# Altium PCB MD041A_ASCII.PcbDoc (part 1 of 6)
Units mil, origin at the board's own origin, x right, y up, seen from the top; angles counter-clockwise.
Board outline 6709.84 x 5059.84 mil, 4 copper layers (Top Layer, Signal Layer 1, Signal Layer 2, Bottom Layer), stack 61.2 mil thick; 351 components, 206 nets, 927 pads, 324 vias.
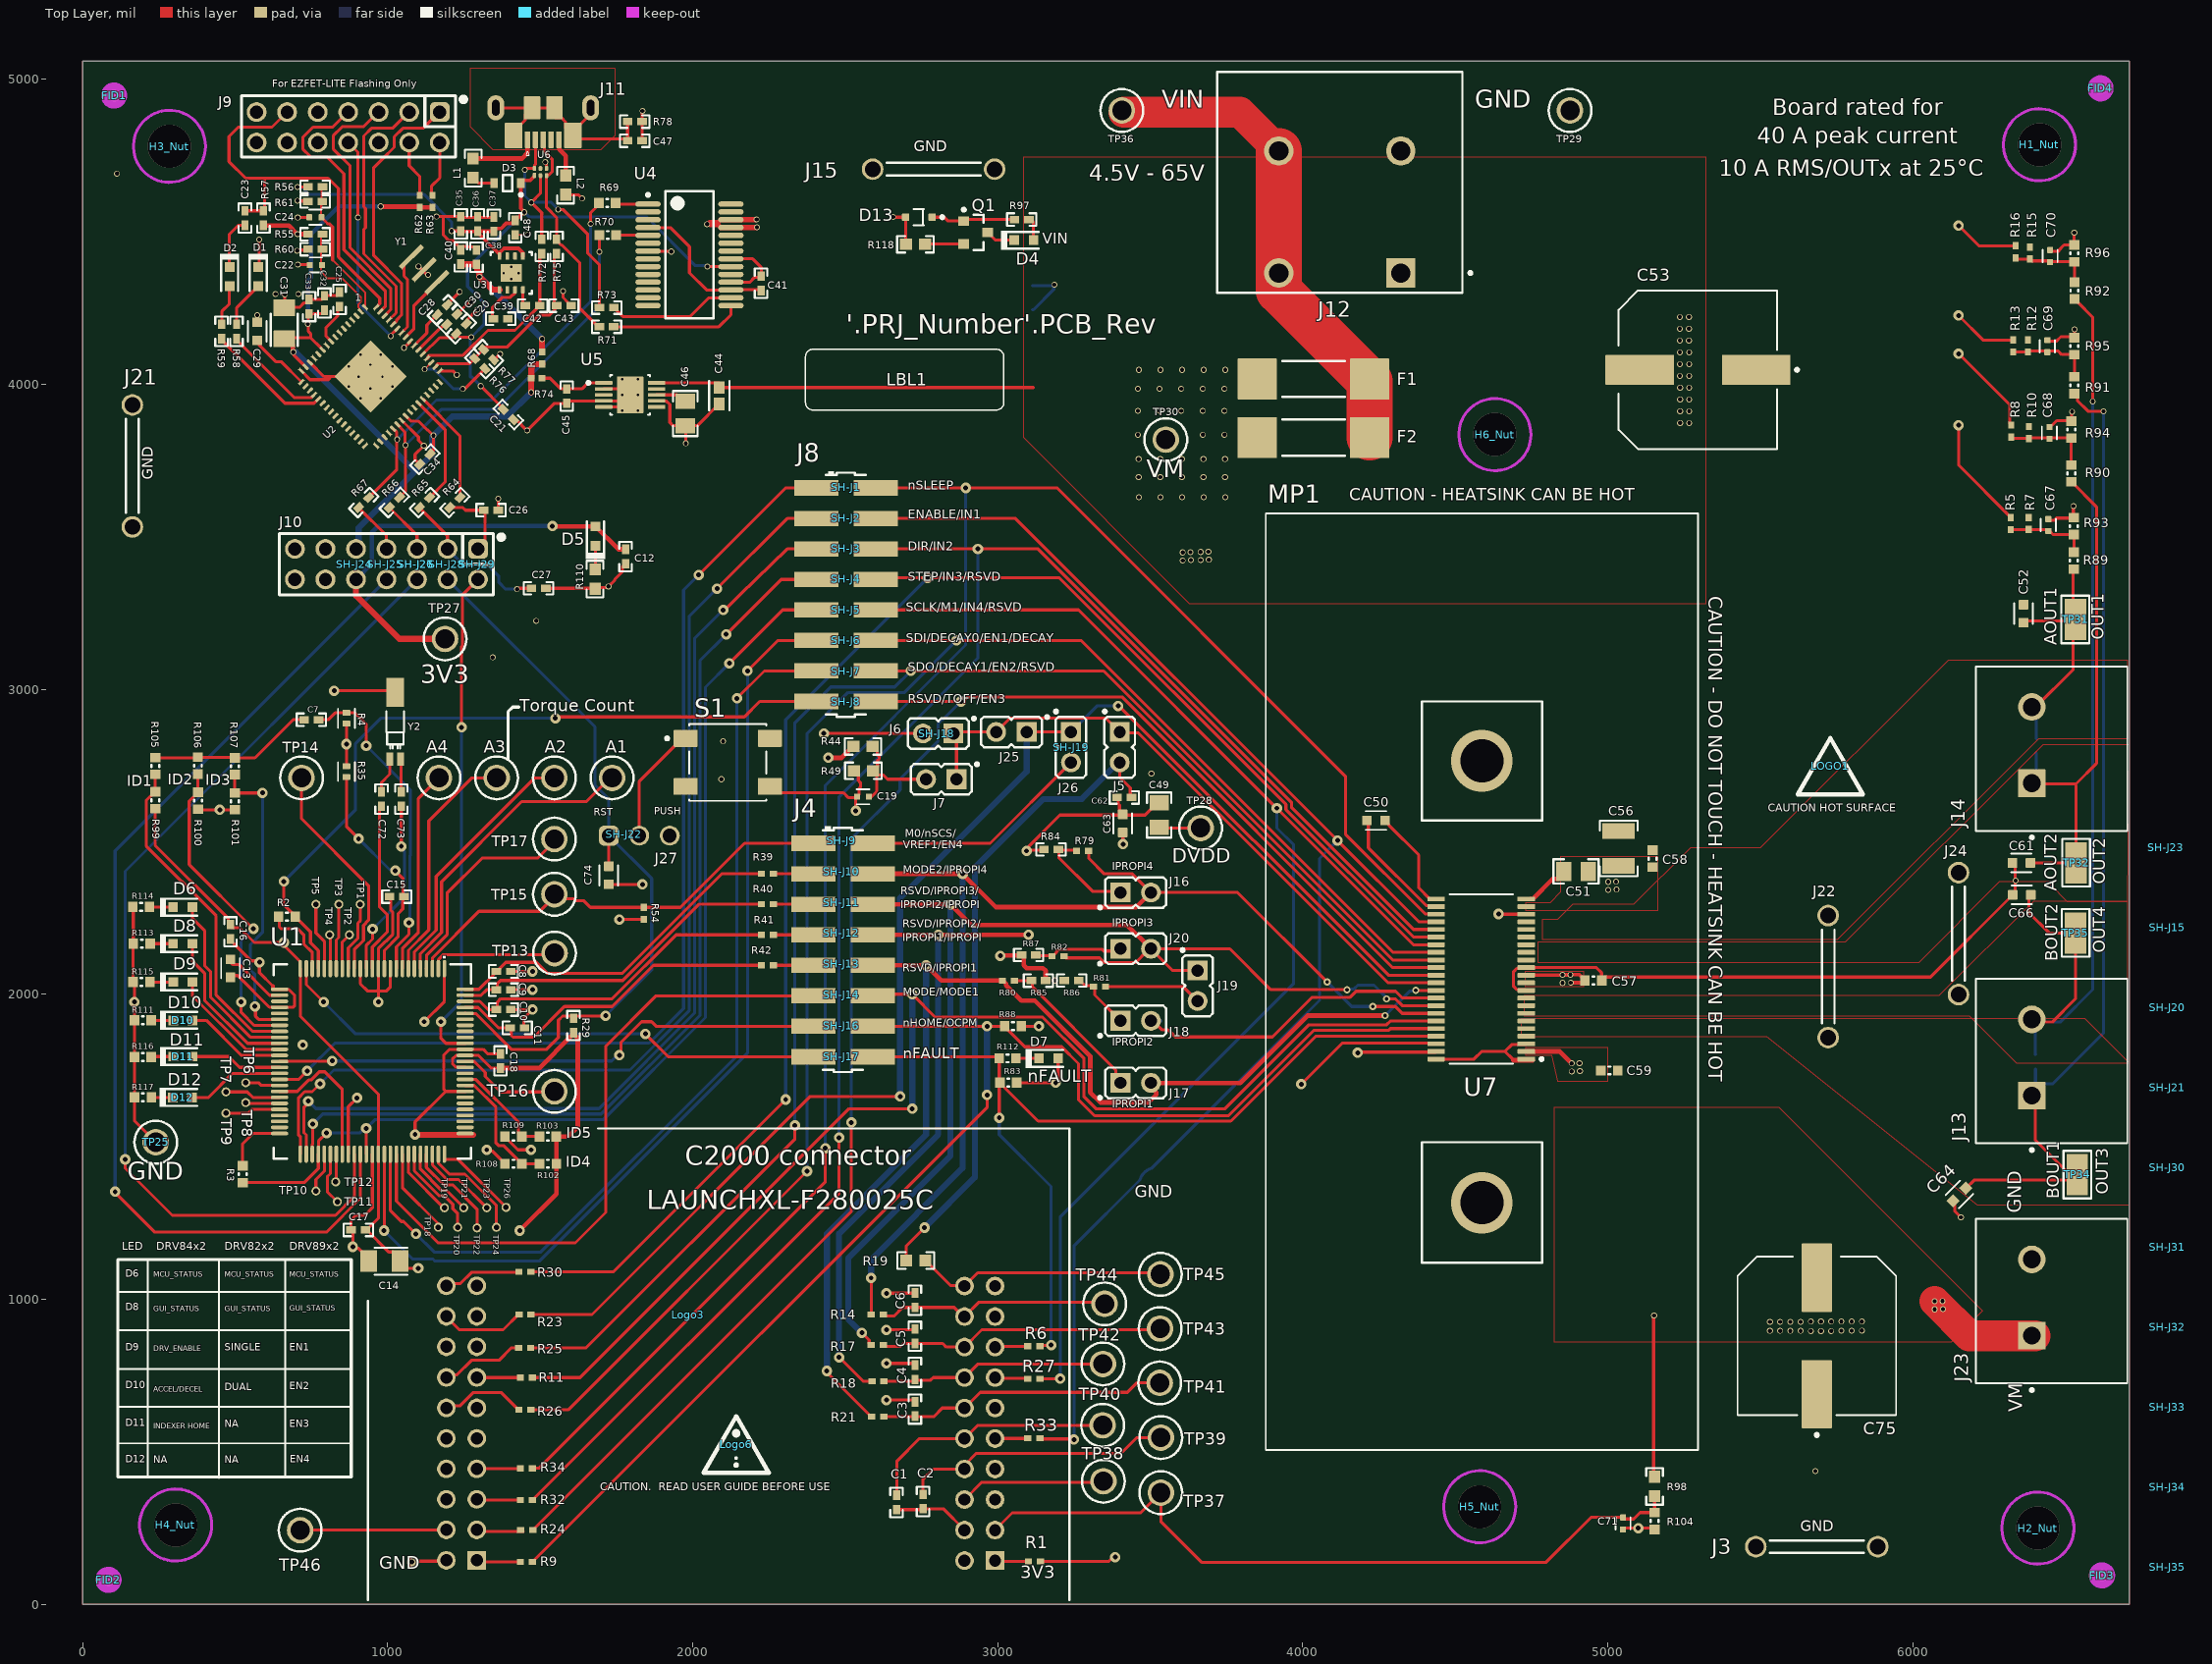
[diagram p0: Top Layer view]
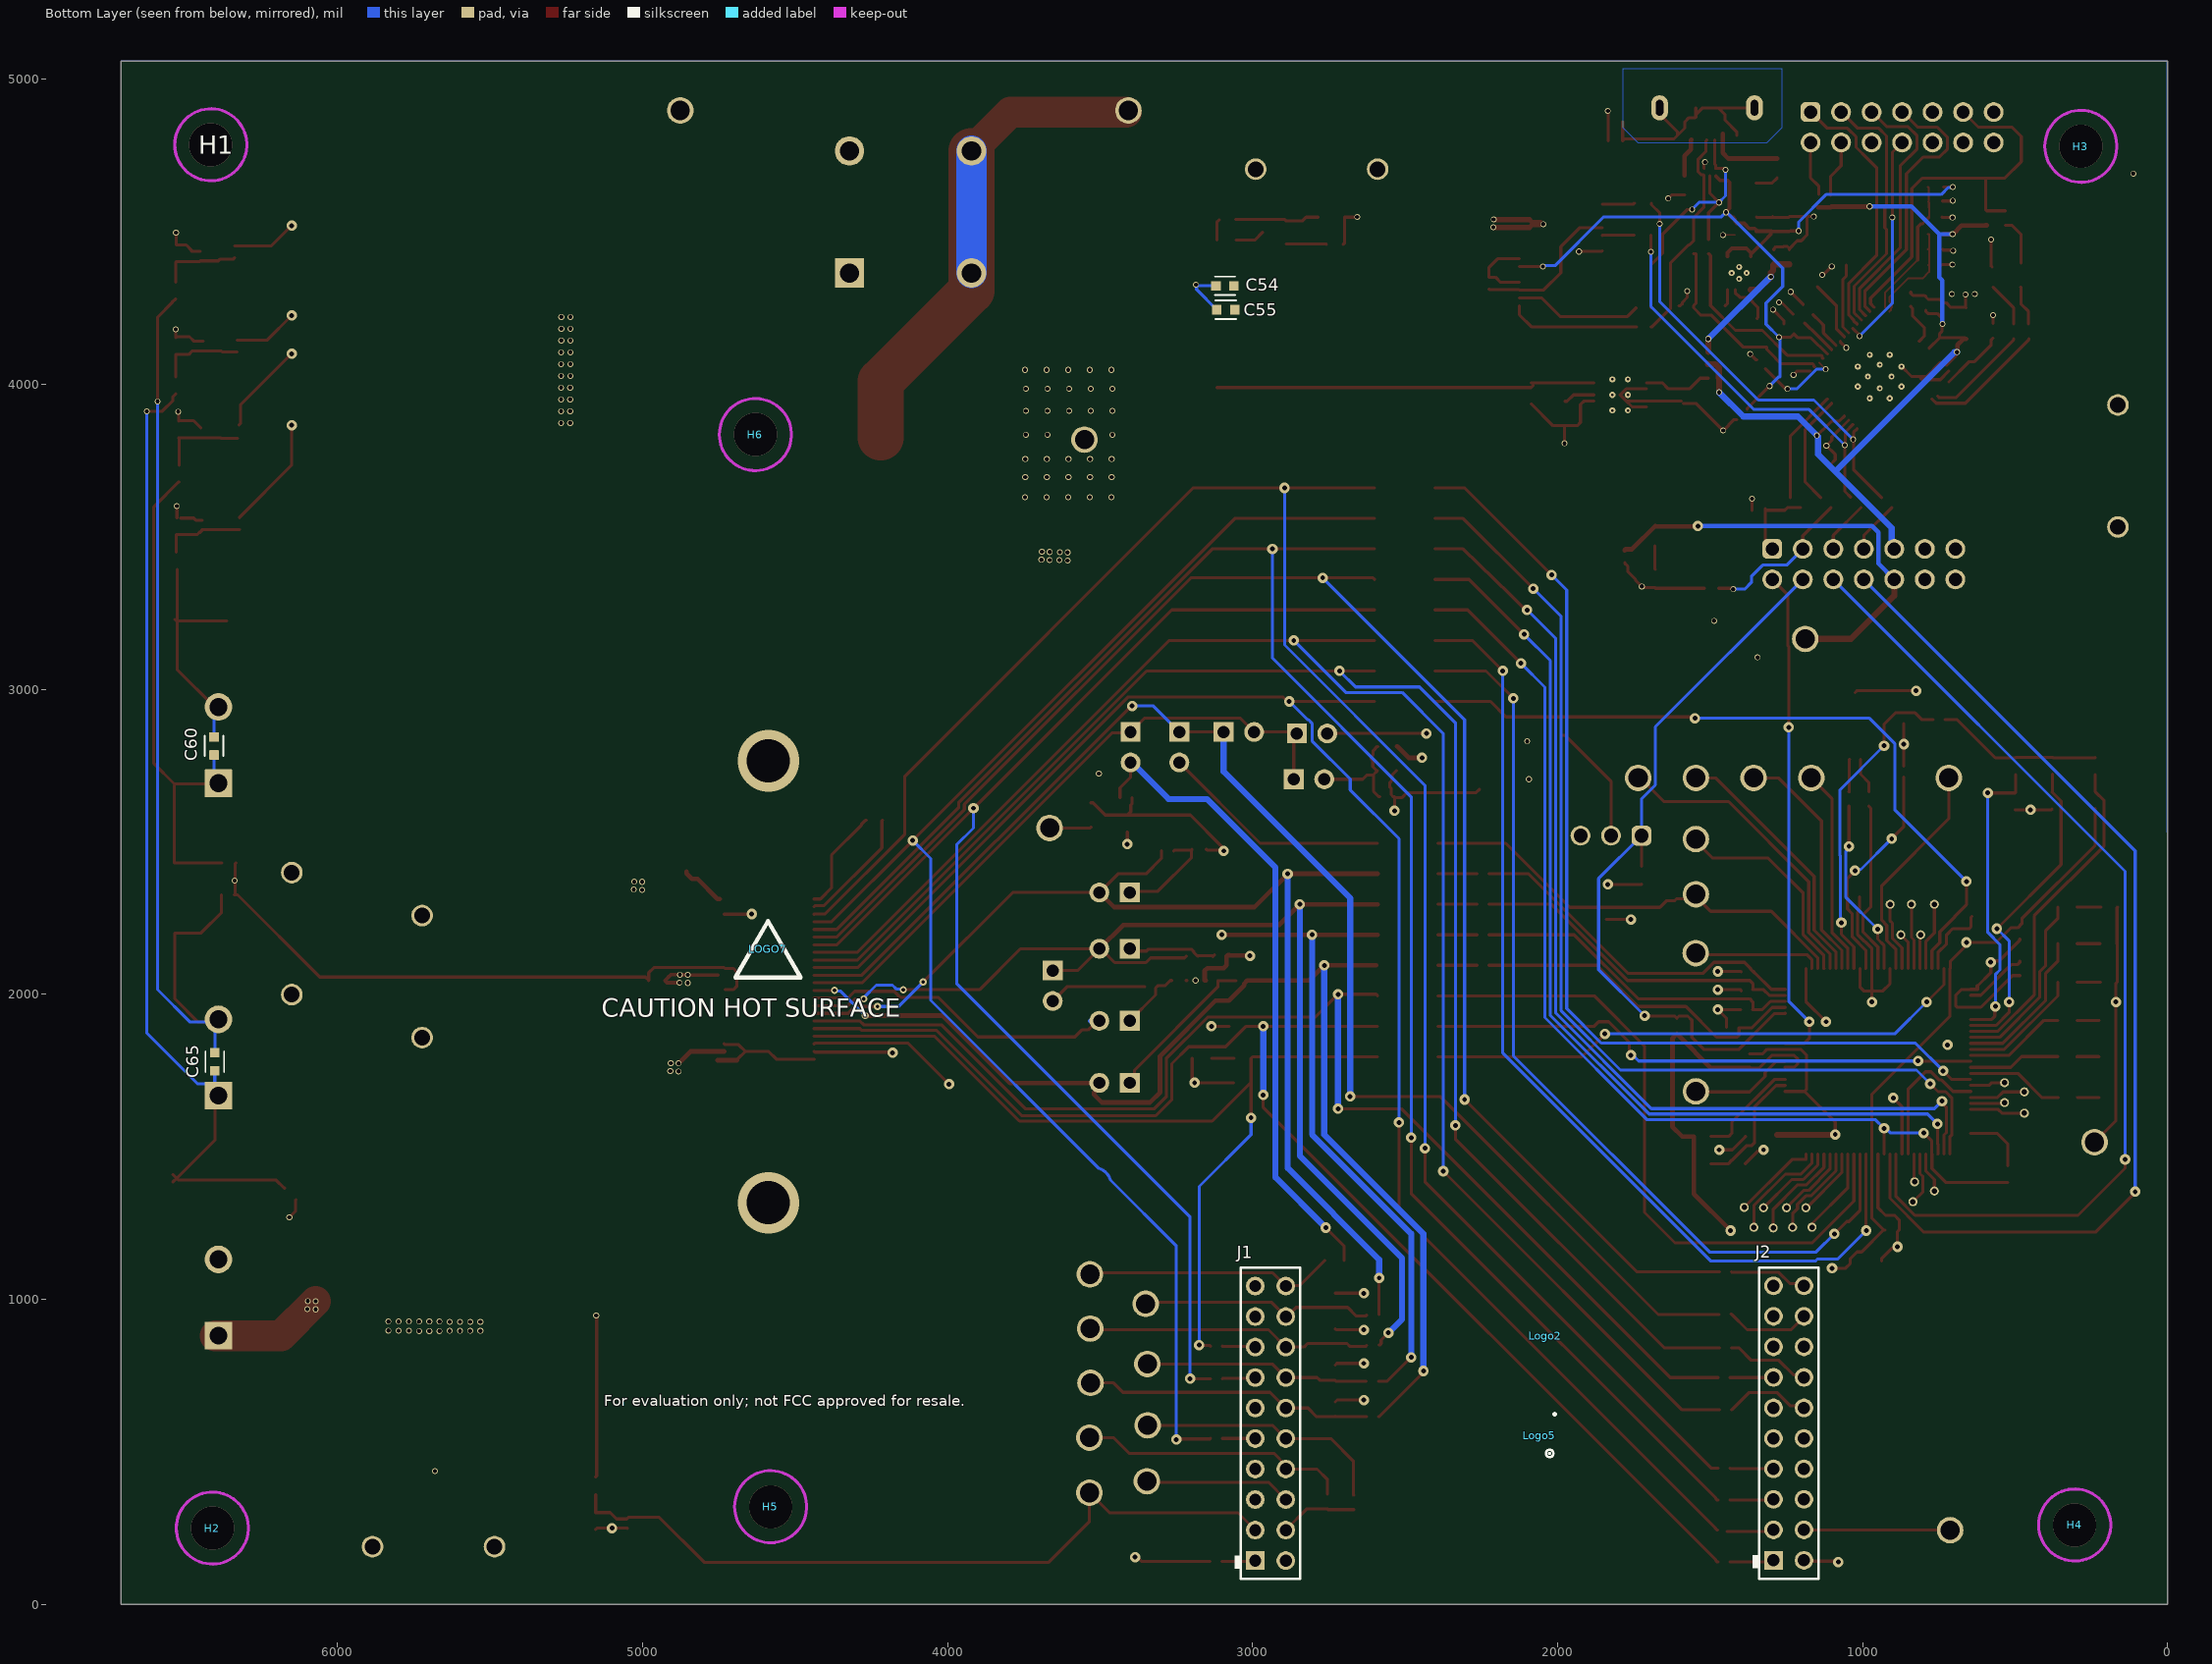
[diagram p1: Bottom Layer view, seen from below]
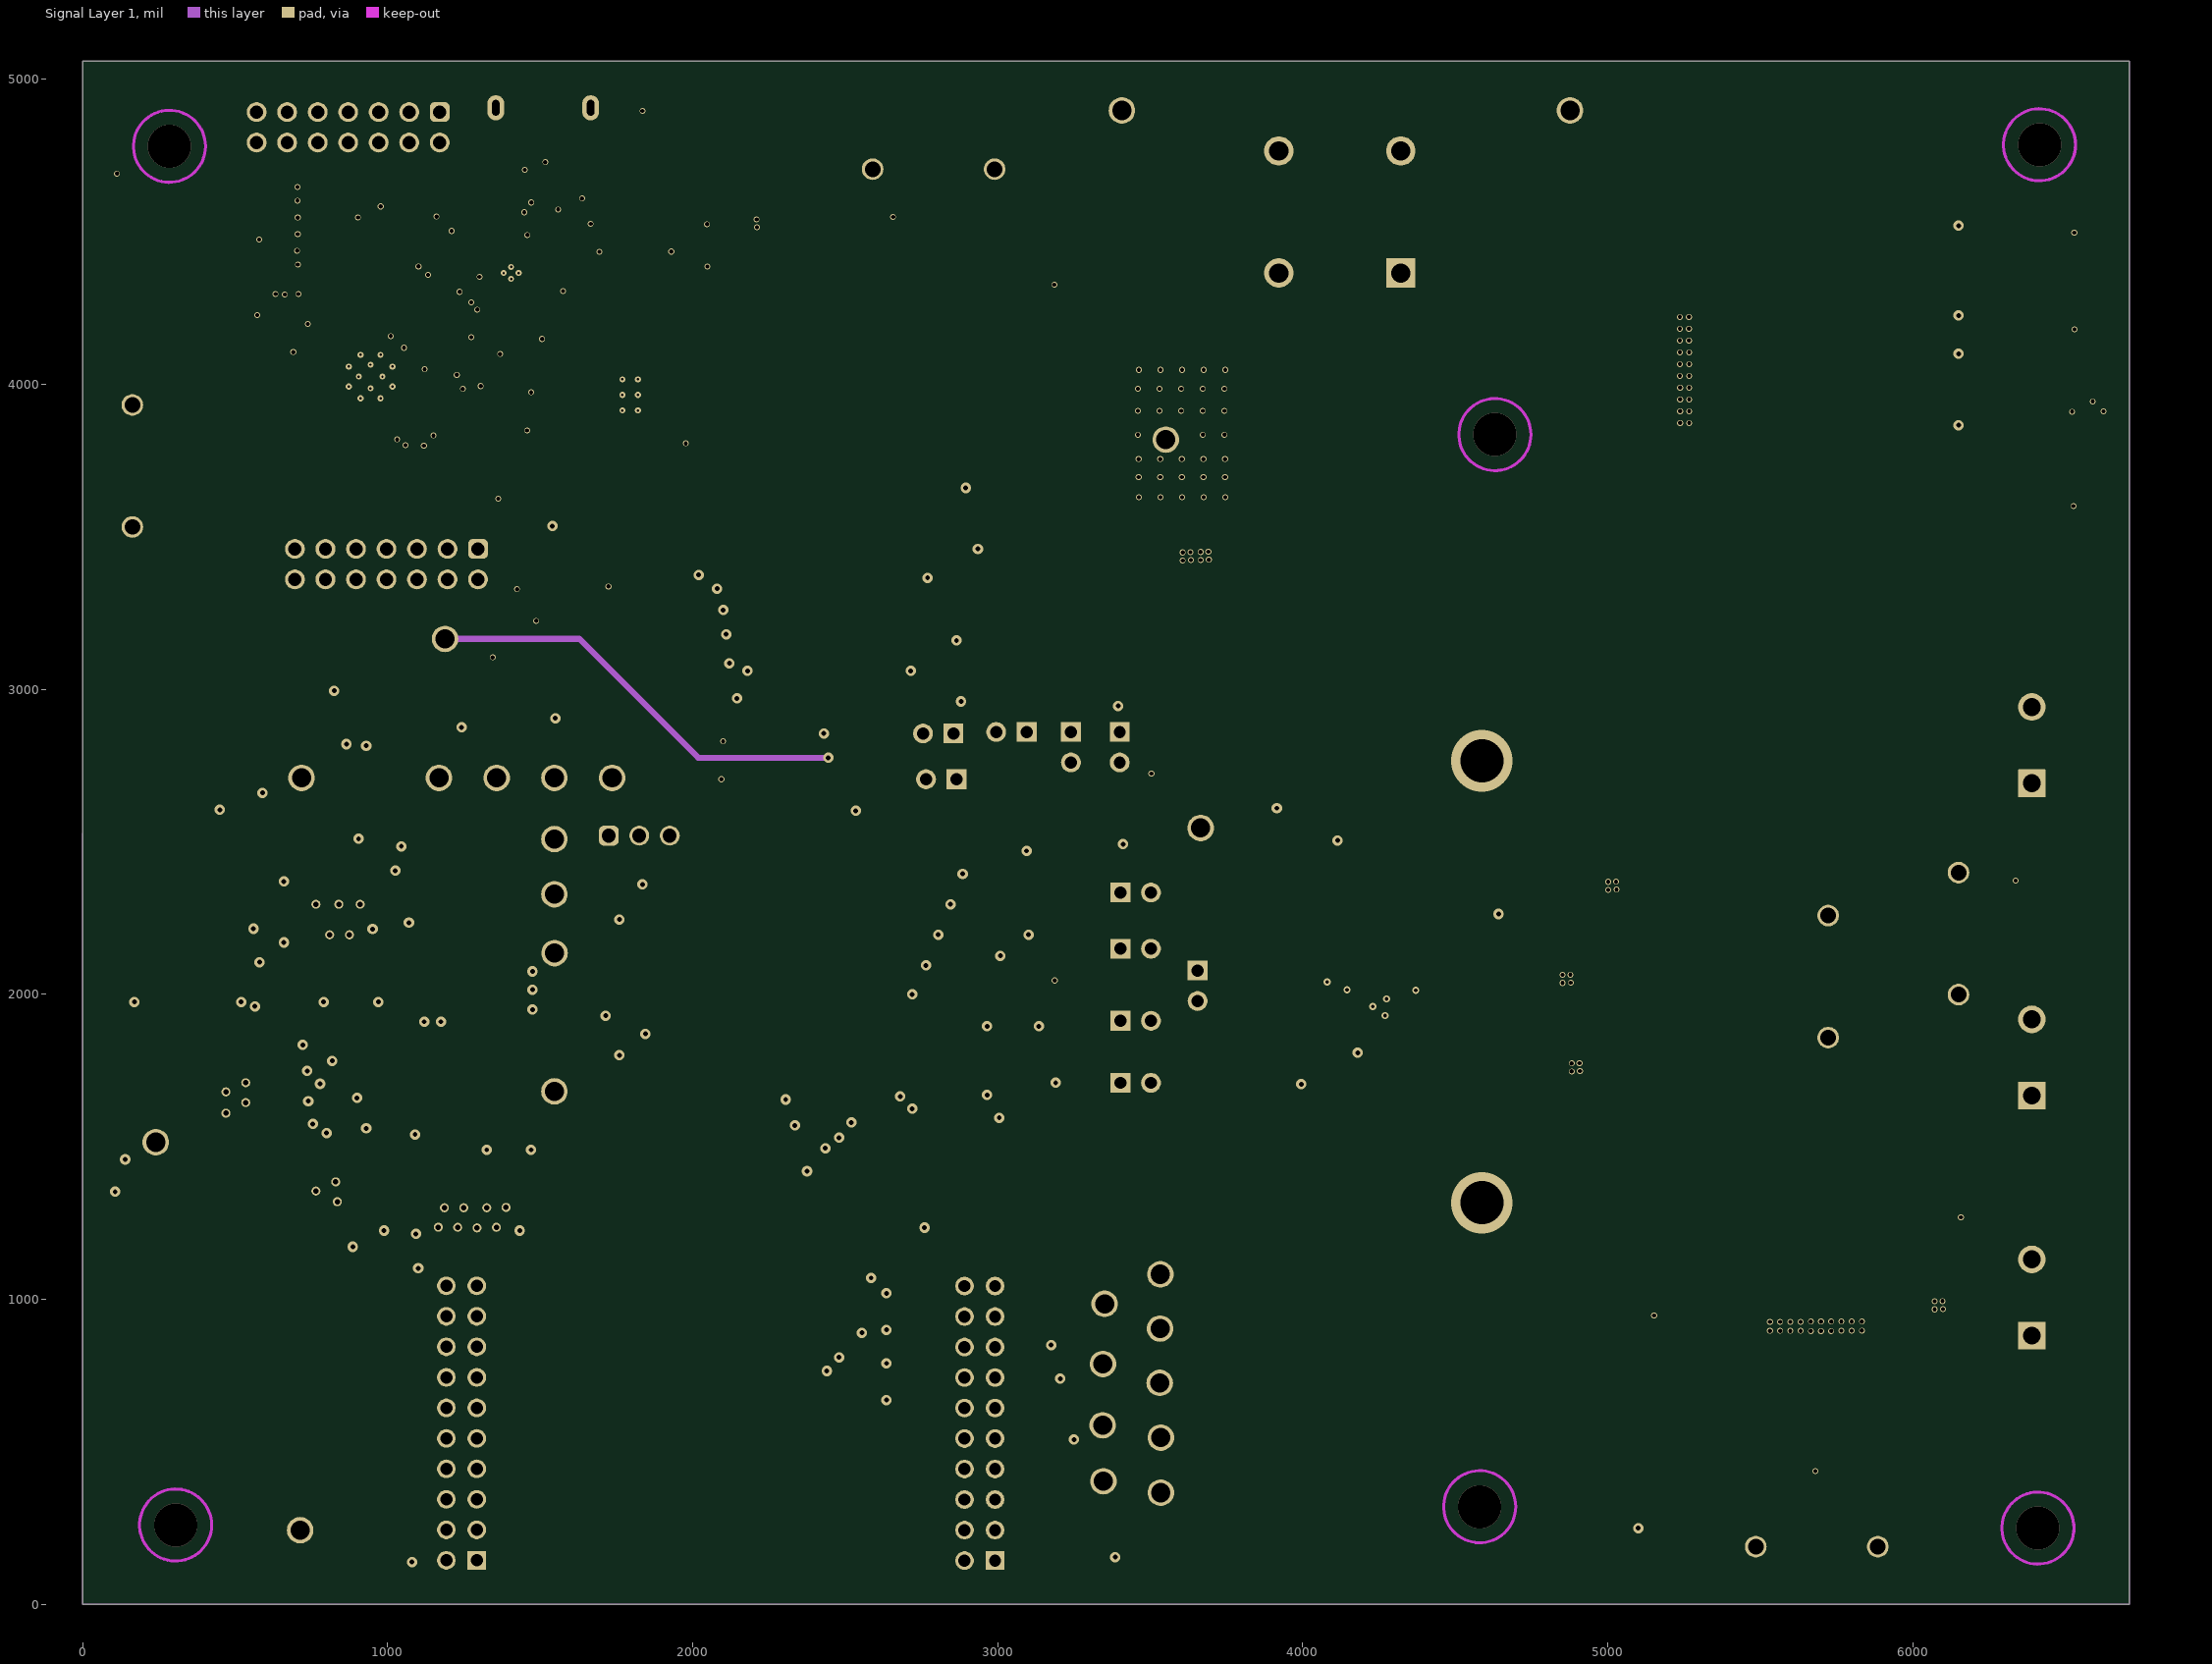
[diagram p2: Signal Layer 1]
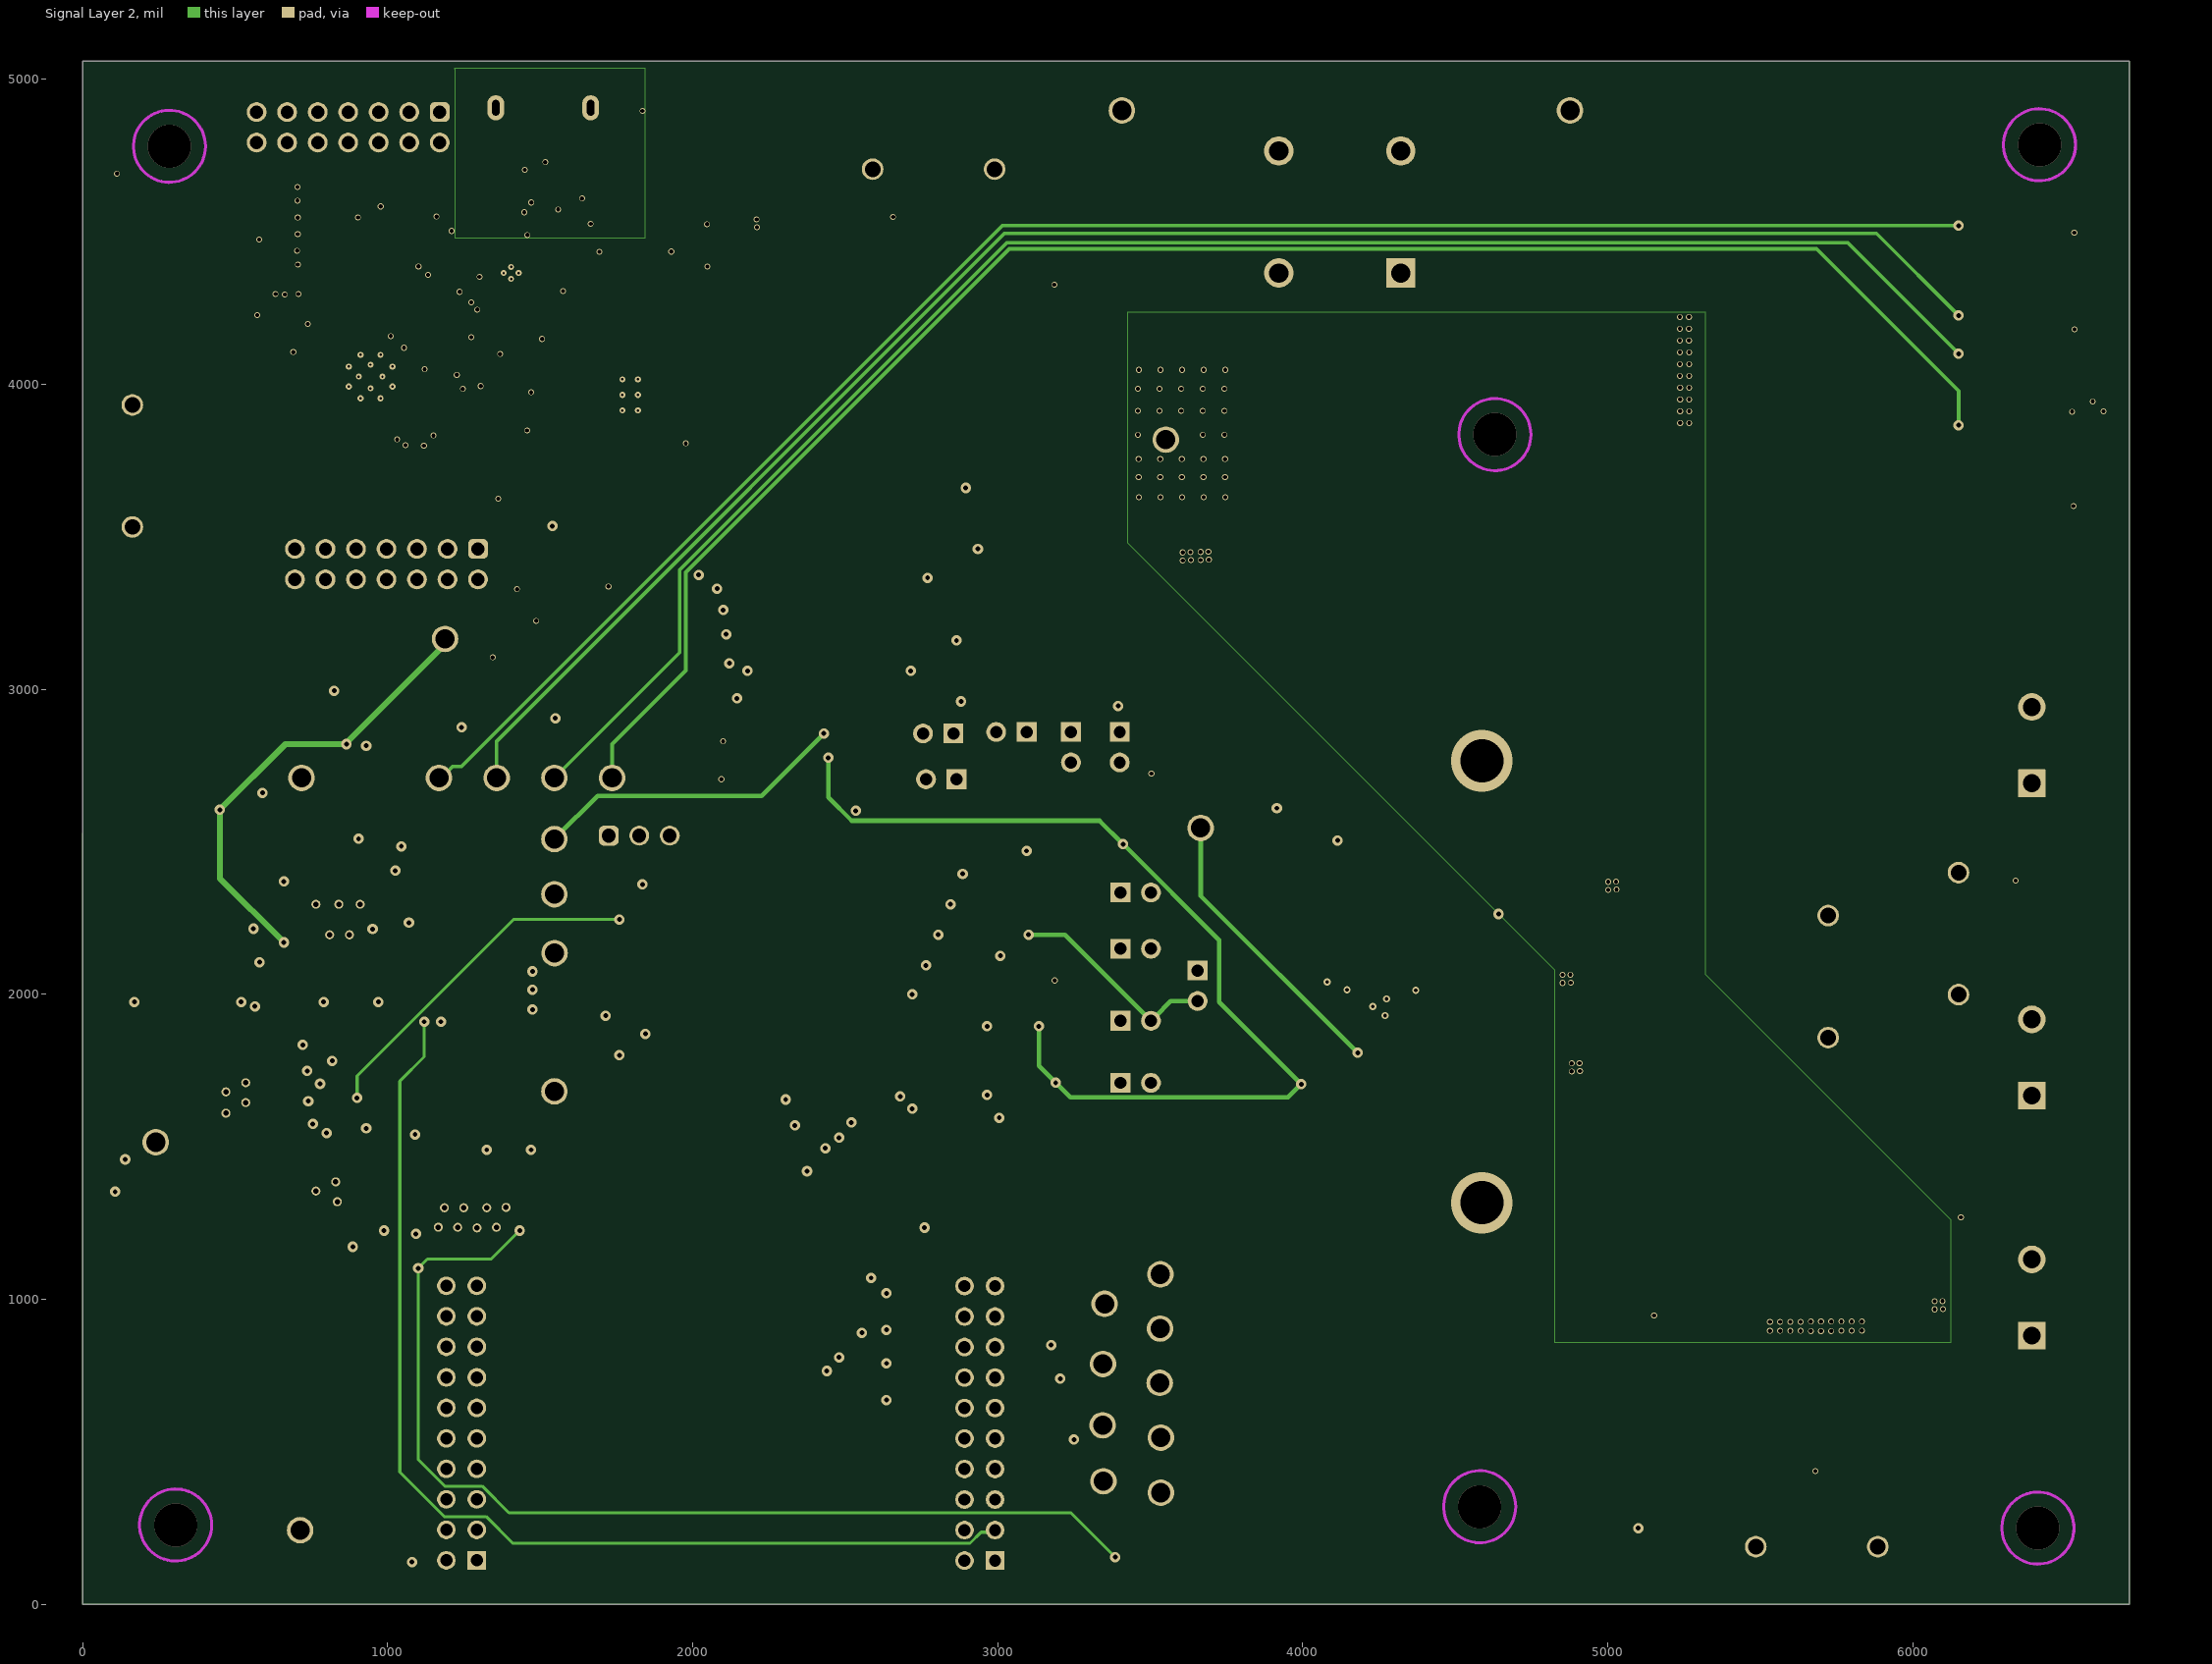
[diagram p3: Signal Layer 2]

## Layer stack, top to bottom
Top Solder: solder mask 0.4, Solder Resist, Dk 3.5
Top Layer: signal copper 2.8
Dielectric 1: prepreg 11.4, FR4 370, Dk 4.2
Signal Layer 1: signal copper 1.4
Dielectric 2: core 30, FR4 370, Dk 4.2
Signal Layer 2: signal copper 1.4
Dielectric 3: prepreg 11.4, FR4 370, Dk 4.2
Bottom Layer: signal copper 2.8
Bottom Solder: solder mask 0.4, Solder Resist, Dk 3.5

## Board outline
0,0 6709.84,0 6709.84,5059.84 0,5059.84

## Design rules (kind name [scope] priority, off if disabled: settings)
AcuteAngle [All] p0: scope1count=1 scope1_0_kind=Board scope1_0_value=Board scope2count=1 scope2_0_kind=Board scope2_0_value=Board commentlength=0 minimum=4.50000000000000E+0001
AcuteAngle [All] p1: minimum=4.50000000000000E+0001 checktracksonly=FALSE
AssemblyTestPointUsage [All] p0: scope1count=1 scope1_0_kind=Board scope1_0_value=Board scope2count=1 scope2_0_kind=Board scope2_0_value=Board commentlength=0
AssemblyTestPointUsage [All] p1: valid=2
AssemblyTestpoint [All] p0: scope1count=1 scope1_0_kind=Board scope1_0_value=Board scope2count=1 scope2_0_kind=Board scope2_0_value=Board commentlength=0
BoardOutlineClearance [All] p0 off: scope1count=1 scope1_0_kind=Board scope1_0_value=Board scope2count=1 scope2_0_kind=Board scope2_0_value=Board commentlength=172 gap=75 // Protel DXP Scope 1 Expression Was: OnCopper and Not InComponentClass('Logo') and not InComponentClass('FiducialMark') and not InRegion(1000,500,4000,800) and not InPoly
BoardOutlineClearance BoardOutlineClearance_Poly [All] p0 off: scope1count=1 scope1_0_kind=Board scope1_0_value=Board scope2count=1 scope2_0_kind=Board scope2_0_value=Board commentlength=58 gap=25 // Protel DXP Scope 1 Expression Was: OnCopper and IsPoly
BoardOutlineClearance BoardOutlineClearance_MountingHoles [All] p0 off: scope1count=1 scope1_0_kind=Board scope1_0_value=Board scope2count=1 scope2_0_kind=Board scope2_0_value=Board commentlength=86 gap=39.37 // Protel DXP Scope 1 Expression Was: OnCopper and InComponentClass('Mounting Holes')
BoardOutlineClearance BoardOutlineClearance_MountingHoles [OnCopper and InComponentClass('Mounting Holes')] p1: gap=39.37 ignorepadtopadclearanceinfootprint=FALSE
BoardOutlineClearance BoardOutlineClearance_Poly [OnCopper and IsPoly] p2: gap=25 ignorepadtopadclearanceinfootprint=FALSE
BoardOutlineClearance [OnCopper and Not InComponentClass('Logo') and not InComponentClass('FiducialMark') and not InRegion(1000,500,4000,800) and not InPoly] p3: gap=75 ignorepadtopadclearanceinfootprint=FALSE
Clearance [All] p0: scope1count=1 scope1_0_kind=Board scope1_0_value=Board scope2count=1 scope2_0_kind=Board scope2_0_value=Board commentlength=0 gap=7.87
Clearance Clearance_FiducialMark [All] p0 off: scope1count=1 scope1_0_kind=Board scope1_0_value=Board scope2count=1 scope2_0_kind=Board scope2_0_value=Board commentlength=81 gap=0 // Protel DXP Scope 2 Expression Was: IsPad and InComponentClass('FiducialMark')
Clearance Clearance_Poly [All] p0 off: scope1count=1 scope1_0_kind=Board scope1_0_value=Board scope2count=1 scope2_0_kind=Board scope2_0_value=Board commentlength=48 gap=25 // Protel DXP Scope 1 Expression Was: InPolygon
Clearance Clearance_Keepouts [All] p0 off: scope1count=1 scope1_0_kind=Board scope1_0_value=Board scope2count=1 scope2_0_kind=Board scope2_0_value=Board commentlength=99 gap=0 // Protel DXP Scope 2 Expression Was: ((IsTrack Or IsArc) And Not InPoly) And IsFree and IsKeepOut
Clearance Clearance_1 [All] p0 off: scope1count=1 scope1_0_kind=Board scope1_0_value=Board scope2count=1 scope2_0_kind=Board scope2_0_value=Board commentlength=74 gap=5.98 // Protel DXP Scope 1 Expression Was: InNamedPolygon('TOP_LAYER_VM_P046')
Clearance Clearance_2 [All] p0 off: scope1count=1 scope1_0_kind=Board scope1_0_value=Board scope2count=1 scope2_0_kind=Board scope2_0_value=Board commentlength=76 gap=10 // Protel DXP Scope 1 Expression Was: InNamedPolygon('TOP_LAYER_OUT2_P040')
Clearance Clearance_3 [All] p0 off: scope1count=1 scope1_0_kind=Board scope1_0_value=Board scope2count=1 scope2_0_kind=Board scope2_0_value=Board commentlength=198 gap=10 // Protel DXP Scope 1 Expression Was: InNamedPolygon('TOP_LAYER_VM_P042') Or  InNamedPolygon('TOP_LAYER_VM_P044') Or  InNamedPolygon('TOP_LAYER_OUT2_P040') Or  InNamedPolygon('TOP_LAYER_OUT1_P038')
Clearance Clearance_4 [All] p0 off: scope1count=1 scope1_0_kind=Board scope1_0_value=Board scope2count=1 scope2_0_kind=Board scope2_0_value=Board commentlength=154 gap=10 // Protel DXP Scope 1 Expression Was: InNamedPolygon('TOP_LAYER_VM_P123') Or  InNamedPolygon('TOP_LAYER_VM_P123') Or  InNamedPolygon('TOP_LAYER_VM_P123')
Clearance Clearance_5 [All] p0 off: scope1count=1 scope1_0_kind=Board scope1_0_value=Board scope2count=1 scope2_0_kind=Board scope2_0_value=Board commentlength=77 gap=10 // Protel DXP Scope 1 Expression Was: InNamedPolygon('TOP_LAYER_NONET_P072')
Clearance Clearance_6 [All] p0 off: scope1count=1 scope1_0_kind=Board scope1_0_value=Board scope2count=1 scope2_0_kind=Board scope2_0_value=Board commentlength=250 gap=10 // Protel DXP Scope 1 Expression Was: InNamedPolygon('BOTTOM_LAYER_EZFET_USB_SHIELD_P002') Or  InNamedPolygon('TOP_LAYER_EZFET_USB_SHIELD_P201') Or  InNamedPolygon('SIGNAL_LAYER_2_EZFET_VBUS_P018') Or  InNamedPolygon('SIGNAL_LAYER_2_EZFET_VCC_P016')
Clearance Clearance_7 [All] p0 off: scope1count=1 scope1_0_kind=Board scope1_0_value=Board scope2count=1 scope2_0_kind=Board scope2_0_value=Board commentlength=120 gap=10 // Protel DXP Scope 1 Expression Was: InNamedPolygon('TOP_LAYER_NONET_P089') Or  InNamedPolygon('TOP_LAYER_NONET_P090')
Clearance Clearance_8 [All] p0 off: scope1count=1 scope1_0_kind=Board scope1_0_value=Board scope2count=1 scope2_0_kind=Board scope2_0_value=Board commentlength=933 gap=10 // Protel DXP Scope 1 Expression Was: InNamedPolygon('BOTTOM_LAYER_NONET_P079') Or  InNamedPolygon('SIGNAL_LAYER_2_NONET_P078') Or  InNamedPolygon('SIGNAL_LAYER_1_NONET_P077') Or  InNamedPolygon('TOP_LAYER_NONET_P083') Or  InNamedPolygon('BOTTOM_LAYER_NONET_P072') Or  InNamedPolygon('SIGNAL_LAYER_2_NONET_P070') Or  InNamedPolygon('SIGNAL_LAYER_1_NONET_P059') Or  InNamedPolygon('TOP_LAYER_OUT2_P058') Or  InNamedPolygon('BOTTOM_LAYER_NONET_P056') Or  InNamedPolygon('SIGNAL_LAYER_2_NONET_P054') Or  InNamedPolygon('SIGNAL_LAYER_1_NONET_P052') Or  InNamedPolygon('TOP_LAYER_OUT1_P050') Or  InNamedPolygon('BOTTOM_LAYER_VM_P044') Or  InNamedPolygon('SIGNAL_LAYER_2_VM_P042') Or  InNamedPolygon('SIGNAL_LAYER_1_VM_P040') Or  InNamedPolygon('TOP_LAYER_VM_P038') Or  InNamedPolygon('BOTTOM_LAYER_VM_P036') Or  InNamedPolygon('SIGNAL_LAYER_2_VM_P018') Or  InNamedPolygon('SIGNAL_LAYER_1_VM_P016') Or  InNamedPolygon('TOP_LAYER_VM_P003')
Clearance Clearance_9 [All] p0 off: scope1count=1 scope1_0_kind=Board scope1_0_value=Board scope2count=1 scope2_0_kind=Board scope2_0_value=Board commentlength=76 gap=10 // Protel DXP Scope 1 Expression Was: InNamedPolygon('TOP_LAYER_OUT1_P000')
Clearance Clearance_10 [All] p0 off: scope1count=1 scope1_0_kind=Board scope1_0_value=Board scope2count=1 scope2_0_kind=Board scope2_0_value=Board commentlength=76 gap=10 // Protel DXP Scope 1 Expression Was: InNamedPolygon('TOP_LAYER_OUT1_P000')
Clearance Clearance_11 [All] p0 off: scope1count=1 scope1_0_kind=Board scope1_0_value=Board scope2count=1 scope2_0_kind=Board scope2_0_value=Board commentlength=76 gap=10 // Protel DXP Scope 1 Expression Was: InNamedPolygon('TOP_LAYER_OUT2_P099')
Clearance Clearance_12 [All] p0 off: scope1count=1 scope1_0_kind=Board scope1_0_value=Board scope2count=1 scope2_0_kind=Board scope2_0_value=Board commentlength=76 gap=10 // Protel DXP Scope 1 Expression Was: InNamedPolygon('TOP_LAYER_OUT2_P099')
Clearance Clearance_13 [All] p0 off: scope1count=1 scope1_0_kind=Board scope1_0_value=Board scope2count=1 scope2_0_kind=Board scope2_0_value=Board commentlength=77 gap=10 // Protel DXP Scope 1 Expression Was: InNamedPolygon('TOP_LAYER_NONET_P093')
Clearance Clearance_14 [All] p0 off: scope1count=1 scope1_0_kind=Board scope1_0_value=Board scope2count=1 scope2_0_kind=Board scope2_0_value=Board commentlength=77 gap=3.94 // Protel DXP Scope 1 Expression Was: InNamedPolygon('TOP_LAYER_NONET_P093')
Clearance Clearance_15 [All] p0 off: scope1count=1 scope1_0_kind=Board scope1_0_value=Board scope2count=1 scope2_0_kind=Board scope2_0_value=Board commentlength=76 gap=3.94 // Protel DXP Scope 1 Expression Was: InNamedPolygon('TOP_LAYER_OUT1_P000')
Clearance Clearance_16 [All] p0 off: scope1count=1 scope1_0_kind=Board scope1_0_value=Board scope2count=1 scope2_0_kind=Net scope2_0_value=OUT1 commentlength=76 gap=3.94 // Protel DXP Scope 1 Expression Was: InNamedPolygon('TOP_LAYER_OUT1_P000')
Clearance Clearance_17 [All] p0 off: scope1count=1 scope1_0_kind=Board scope1_0_value=Board scope2count=1 scope2_0_kind=Board scope2_0_value=Board commentlength=76 gap=10 // Protel DXP Scope 1 Expression Was: InNamedPolygon('TOP_LAYER_OUT1_P000')
Clearance Clearance_18 [All] p0: scope1count=1 scope1_0_kind=Net scope1_0_value=OUT1 scope2count=1 scope2_0_kind=Board scope2_0_value=Board commentlength=0 gap=10
Clearance Clearance_19 [All] p0 off: scope1count=1 scope1_0_kind=Board scope1_0_value=Board scope2count=1 scope2_0_kind=Board scope2_0_value=Board commentlength=76 gap=10 // Protel DXP Scope 1 Expression Was: InNamedPolygon('TOP_LAYER_OUT1_P103')
Clearance Clearance_20 [All] p0 off: scope1count=1 scope1_0_kind=Board scope1_0_value=Board scope2count=1 scope2_0_kind=Board scope2_0_value=Board commentlength=77 gap=10 // Protel DXP Scope 1 Expression Was: InNamedPolygon('TOP_LAYER_NONET_P101')
Clearance Clearance_21 [All] p0 off: scope1count=1 scope1_0_kind=Board scope1_0_value=Board scope2count=1 scope2_0_kind=Board scope2_0_value=Board commentlength=76 gap=10 // Protel DXP Scope 1 Expression Was: InNamedPolygon('TOP_LAYER_OUT2_P107')
Clearance Clearance_22 [All] p0 off: scope1count=1 scope1_0_kind=Board scope1_0_value=Board scope2count=1 scope2_0_kind=Board scope2_0_value=Board commentlength=77 gap=10 // Protel DXP Scope 1 Expression Was: InNamedPolygon('TOP_LAYER_NONET_P105')
Clearance Clearance_23 [All] p0 off: scope1count=1 scope1_0_kind=Board scope1_0_value=Board scope2count=1 scope2_0_kind=Board scope2_0_value=Board commentlength=77 gap=10 // Protel DXP Scope 1 Expression Was: InNamedPolygon('TOP_LAYER_NONET_P083')
Clearance Clearance_24 [All] p0 off: scope1count=1 scope1_0_kind=Board scope1_0_value=Board scope2count=1 scope2_0_kind=Board scope2_0_value=Board commentlength=82 gap=10 // Protel DXP Scope 1 Expression Was: InNamedPolygon('SIGNAL_LAYER_1_NONET_P111')
Clearance Clearance_25 [All] p0 off: scope1count=1 scope1_0_kind=Board scope1_0_value=Board scope2count=1 scope2_0_kind=Board scope2_0_value=Board commentlength=80 gap=10 // Protel DXP Scope 1 Expression Was: InNamedPolygon('BOTTOM_LAYER_NONET_P115')
Clearance Clearance_26 [All] p0 off: scope1count=1 scope1_0_kind=Board scope1_0_value=Board scope2count=1 scope2_0_kind=Board scope2_0_value=Board commentlength=82 gap=10 // Protel DXP Scope 1 Expression Was: InNamedPolygon('SIGNAL_LAYER_2_NONET_P113')
Clearance Clearance_27 [All] p0 off: scope1count=1 scope1_0_kind=Board scope1_0_value=Board scope2count=1 scope2_0_kind=Board scope2_0_value=Board commentlength=118 gap=10 // Protel DXP Scope 1 Expression Was: InNamedPolygon('TOP_LAYER_OUT1_P129') Or  InNamedPolygon('TOP_LAYER_OUT2_P173')
Clearance Clearance_28 [All] p0 off: scope1count=1 scope1_0_kind=Board scope1_0_value=Board scope2count=1 scope2_0_kind=Board scope2_0_value=Board commentlength=75 gap=10 // Protel DXP Scope 1 Expression Was: InNamedPolygon('TOP_LAYER_GND_P117')
Clearance Clearance_29 [All] p0 off: scope1count=1 scope1_0_kind=Board scope1_0_value=Board scope2count=1 scope2_0_kind=Board scope2_0_value=Board commentlength=114 gap=10 // Protel DXP Scope 1 Expression Was: InNamedPolygon('TOP_LAYER_VM_P127') Or  InNamedPolygon('TOP_LAYER_VM_P085')
Clearance Clearance_30 [All] p0 off: scope1count=1 scope1_0_kind=Board scope1_0_value=Board scope2count=1 scope2_0_kind=Board scope2_0_value=Board commentlength=75 gap=10 // Protel DXP Scope 1 Expression Was: InNamedPolygon('TOP_LAYER_GND_P087')
Clearance Clearance_31 [All] p0 off: scope1count=1 scope1_0_kind=Board scope1_0_value=Board scope2count=1 scope2_0_kind=Board scope2_0_value=Board commentlength=75 gap=10 // Protel DXP Scope 1 Expression Was: InNamedPolygon('TOP_LAYER_GND_P076')
Clearance Clearance_32 [All] p0 off: scope1count=1 scope1_0_kind=Board scope1_0_value=Board scope2count=1 scope2_0_kind=Board scope2_0_value=Board commentlength=80 gap=10 // Protel DXP Scope 1 Expression Was: InNamedPolygon('SIGNAL_LAYER_2_GND_P082')
Clearance Clearance_33 [All] p0 off: scope1count=1 scope1_0_kind=Board scope1_0_value=Board scope2count=1 scope2_0_kind=Board scope2_0_value=Board commentlength=82 gap=10 // Protel DXP Scope 1 Expression Was: InNamedPolygon('SIGNAL_LAYER_2_NONET_P138')
Clearance Clearance_34 [All] p0 off: scope1count=1 scope1_0_kind=Board scope1_0_value=Board scope2count=1 scope2_0_kind=Board scope2_0_value=Board commentlength=80 gap=10 // Protel DXP Scope 1 Expression Was: InNamedPolygon('SIGNAL_LAYER_1_GND_P154')
Clearance Clearance_35 [All] p0 off: scope1count=1 scope1_0_kind=Board scope1_0_value=Board scope2count=1 scope2_0_kind=Board scope2_0_value=Board commentlength=124 gap=10 // Protel DXP Scope 1 Expression Was: InNamedPolygon('SIGNAL_LAYER_1_VM_P148') Or  InNamedPolygon('SIGNAL_LAYER_1_VM_P148')
Clearance Clearance_36 [All] p0 off: scope1count=1 scope1_0_kind=Board scope1_0_value=Board scope2count=1 scope2_0_kind=Board scope2_0_value=Board commentlength=80 gap=10 // Protel DXP Scope 1 Expression Was: InNamedPolygon('SIGNAL_LAYER_2_GND_P156')
Clearance Clearance_37 [All] p0 off: scope1count=1 scope1_0_kind=Board scope1_0_value=Board scope2count=1 scope2_0_kind=Board scope2_0_value=Board commentlength=79 gap=10 // Protel DXP Scope 1 Expression Was: InNamedPolygon('SIGNAL_LAYER_1_VM_P146')
Clearance Clearance_38 [All] p0 off: scope1count=1 scope1_0_kind=Board scope1_0_value=Board scope2count=1 scope2_0_kind=Board scope2_0_value=Board commentlength=82 gap=10 // Protel DXP Scope 1 Expression Was: InNamedPolygon('SIGNAL_LAYER_2_NONET_P138')
Clearance Clearance_39 [All] p0 off: scope1count=1 scope1_0_kind=Board scope1_0_value=Board scope2count=1 scope2_0_kind=Board scope2_0_value=Board commentlength=79 gap=10 // Protel DXP Scope 1 Expression Was: InNamedPolygon('SIGNAL_LAYER_2_VM_P160')
Clearance Clearance_40 [All] p0 off: scope1count=1 scope1_0_kind=Board scope1_0_value=Board scope2count=1 scope2_0_kind=Board scope2_0_value=Board commentlength=78 gap=10 // Protel DXP Scope 1 Expression Was: InNamedPolygon('BOTTOM_LAYER_GND_P162')
Clearance Clearance_41 [All] p0 off: scope1count=1 scope1_0_kind=Board scope1_0_value=Board scope2count=1 scope2_0_kind=Board scope2_0_value=Board commentlength=79 gap=10 // Protel DXP Scope 1 Expression Was: InNamedPolygon('BOTTOM_LAYER_OUT1_P164')
Clearance Clearance_42 [All] p0 off: scope1count=1 scope1_0_kind=Board scope1_0_value=Board scope2count=1 scope2_0_kind=Board scope2_0_value=Board commentlength=77 gap=10 // Protel DXP Scope 1 Expression Was: InNamedPolygon('BOTTOM_LAYER_VM_P235')
Clearance Clearance_43 [All] p0 off: scope1count=1 scope1_0_kind=Board scope1_0_value=Board scope2count=1 scope2_0_kind=Board scope2_0_value=Board commentlength=77 gap=10 // Protel DXP Scope 1 Expression Was: InNamedPolygon('BOTTOM_LAYER_VM_P166')
Clearance Clearance_44 [All] p0 off: scope1count=1 scope1_0_kind=Board scope1_0_value=Board scope2count=1 scope2_0_kind=Board scope2_0_value=Board commentlength=79 gap=10 // Protel DXP Scope 1 Expression Was: InNamedPolygon('BOTTOM_LAYER_OUT2_P163')
Clearance Clearance_45 [All] p0 off: scope1count=1 scope1_0_kind=Board scope1_0_value=Board scope2count=1 scope2_0_kind=Board scope2_0_value=Board commentlength=78 gap=10 // Protel DXP Scope 1 Expression Was: InNamedPolygon('BOTTOM_LAYER_GND_P241')
Clearance Clearance_46 [All] p0 off: scope1count=1 scope1_0_kind=Board scope1_0_value=Board scope2count=1 scope2_0_kind=Board scope2_0_value=Board commentlength=78 gap=10 // Protel DXP Scope 1 Expression Was: InNamedPolygon('BOTTOM_LAYER_GND_P241')
Clearance Clearance_47 [All] p0 off: scope1count=1 scope1_0_kind=Board scope1_0_value=Board scope2count=1 scope2_0_kind=Board scope2_0_value=Board commentlength=80 gap=10 // Protel DXP Scope 1 Expression Was: InNamedPolygon('SIGNAL_LAYER_1_GND_P184')
Clearance Clearance_48 [All] p0 off: scope1count=1 scope1_0_kind=Board scope1_0_value=Board scope2count=1 scope2_0_kind=Board scope2_0_value=Board commentlength=80 gap=10 // Protel DXP Scope 1 Expression Was: InNamedPolygon('SIGNAL_LAYER_1_GND_P190')
Clearance Clearance_49 [All] p0 off: scope1count=1 scope1_0_kind=Board scope1_0_value=Board scope2count=1 scope2_0_kind=Board scope2_0_value=Board commentlength=84 gap=10 // Protel DXP Scope 1 Expression Was: InNamedPolygon('SIGNAL_LAYER_2_MCU_3V3_P192')
Clearance Clearance_50 [All] p0 off: scope1count=1 scope1_0_kind=Board scope1_0_value=Board scope2count=1 scope2_0_kind=Board scope2_0_value=Board commentlength=86 gap=10 // Protel DXP Scope 1 Expression Was: InNamedPolygon('SIGNAL_LAYER_2_EZFET_VCC_P132')
Clearance Clearance_51 [All] p0 off: scope1count=1 scope1_0_kind=Board scope1_0_value=Board scope2count=1 scope2_0_kind=Board scope2_0_value=Board commentlength=87 gap=10 // Protel DXP Scope 1 Expression Was: InNamedPolygon('SIGNAL_LAYER_2_EZFET_VBUS_P136')
Clearance Clearance_52 [All] p0 off: scope1count=1 scope1_0_kind=Board scope1_0_value=Board scope2count=1 scope2_0_kind=Board scope2_0_value=Board commentlength=259 gap=10 // Protel DXP Scope 1 Expression Was: InNamedPolygon('SIGNAL_LAYER_2_VM_P177') Or  InNamedPolygon('SIGNAL_LAYER_2_VM_P179') Or  InNamedPolygon('SIGNAL_LAYER_2_VM_P160') Or  InNamedPolygon('SIGNAL_LAYER_2_VM_P175') Or  InNamedPolygon('SIGNAL_LAYER_2_VM_P181')
Clearance Clearance_53 [All] p0 off: scope1count=1 scope1_0_kind=Board scope1_0_value=Board scope2count=1 scope2_0_kind=Board scope2_0_value=Board commentlength=75 gap=10 // Protel DXP Scope 1 Expression Was: InNamedPolygon('TOP_LAYER_GND_P086')
Clearance Clearance_54 [All] p0 off: scope1count=1 scope1_0_kind=Board scope1_0_value=Board scope2count=1 scope2_0_kind=Board scope2_0_value=Board commentlength=76 gap=10 // Protel DXP Scope 1 Expression Was: InNamedPolygon('TOP_LAYER_P_IN_P227')
Clearance Clearance_55 [All] p0 off: scope1count=1 scope1_0_kind=Board scope1_0_value=Board scope2count=1 scope2_0_kind=Board scope2_0_value=Board commentlength=76 gap=10 // Protel DXP Scope 1 Expression Was: InNamedPolygon('TOP_LAYER_VBAT_P223')
Clearance Clearance_56 [All] p0 off: scope1count=1 scope1_0_kind=Board scope1_0_value=Board scope2count=1 scope2_0_kind=Board scope2_0_value=Board commentlength=79 gap=10 // Protel DXP Scope 1 Expression Was: InNamedPolygon('TOP_LAYER_NETF1_2_P207')
Clearance Clearance_57 [All] p0 off: scope1count=1 scope1_0_kind=Board scope1_0_value=Board scope2count=1 scope2_0_kind=Board scope2_0_value=Board commentlength=80 gap=10 // Protel DXP Scope 1 Expression Was: InNamedPolygon('SIGNAL_LAYER_2_3V3_P194')
Clearance Clearance_58 [All] p0 off: scope1count=1 scope1_0_kind=Board scope1_0_value=Board scope2count=1 scope2_0_kind=Board scope2_0_value=Board commentlength=81 gap=10 // Protel DXP Scope 1 Expression Was: InNamedPolygon('SIGNAL_LAYER_2_P_IN_P198')
Clearance Clearance_59 [All] p0 off: scope1count=1 scope1_0_kind=Board scope1_0_value=Board scope2count=1 scope2_0_kind=Board scope2_0_value=Board commentlength=81 gap=10 // Protel DXP Scope 1 Expression Was: InNamedPolygon('SIGNAL_LAYER_2_VBAT_P197')
Clearance Clearance_60 [All] p0 off: scope1count=1 scope1_0_kind=Board scope1_0_value=Board scope2count=1 scope2_0_kind=Board scope2_0_value=Board commentlength=84 gap=10 // Protel DXP Scope 1 Expression Was: InNamedPolygon('SIGNAL_LAYER_2_NETF1_2_P196')
Clearance Clearance_61 [All] p0 off: scope1count=1 scope1_0_kind=Board scope1_0_value=Board scope2count=1 scope2_0_kind=Board scope2_0_value=Board commentlength=74 gap=10 // Protel DXP Scope 1 Expression Was: InNamedPolygon('TOP_LAYER_VM_P171')
Clearance Clearance_62 [All] p0 off: scope1count=1 scope1_0_kind=Board scope1_0_value=Board scope2count=1 scope2_0_kind=Board scope2_0_value=Board commentlength=74 gap=10 // Protel DXP Scope 1 Expression Was: InNamedPolygon('TOP_LAYER_VM_P167')
Clearance Clearance_63 [All] p0 off: scope1count=1 scope1_0_kind=Board scope1_0_value=Board scope2count=1 scope2_0_kind=Board scope2_0_value=Board commentlength=74 gap=10 // Protel DXP Scope 1 Expression Was: InNamedPolygon('TOP_LAYER_VM_P167')
Clearance Clearance_64 [All] p0 off: scope1count=1 scope1_0_kind=Board scope1_0_value=Board scope2count=1 scope2_0_kind=Board scope2_0_value=Board commentlength=79 gap=10 // Protel DXP Scope 1 Expression Was: InNamedPolygon('BOTTOM_LAYER_VBAT_P165')
Clearance Clearance_65 [All] p0 off: scope1count=1 scope1_0_kind=Board scope1_0_value=Board scope2count=1 scope2_0_kind=Board scope2_0_value=Board commentlength=82 gap=10 // Protel DXP Scope 1 Expression Was: InNamedPolygon('BOTTOM_LAYER_NETF1_2_P203')
Clearance Clearance_66 [All] p0 off: scope1count=1 scope1_0_kind=Board scope1_0_value=Board scope2count=1 scope2_0_kind=Board scope2_0_value=Board commentlength=79 gap=10 // Protel DXP Scope 1 Expression Was: InNamedPolygon('BOTTOM_LAYER_P_IN_P174')
Clearance Clearance_67 [All] p0 off: scope1count=1 scope1_0_kind=Board scope1_0_value=Board scope2count=1 scope2_0_kind=Board scope2_0_value=Board commentlength=74 gap=3.94 // Protel DXP Scope 1 Expression Was: InNamedPolygon('TOP_LAYER_VM_P085')
Clearance Clearance_68 [All] p0 off: scope1count=1 scope1_0_kind=Board scope1_0_value=Board scope2count=1 scope2_0_kind=Board scope2_0_value=Board commentlength=76 gap=3.94 // Protel DXP Scope 1 Expression Was: InNamedPolygon('TOP_LAYER_OUT1_P129')
Clearance Clearance_69 [All] p0 off: scope1count=1 scope1_0_kind=Board scope1_0_value=Board scope2count=1 scope2_0_kind=Board scope2_0_value=Board commentlength=76 gap=3.94 // Protel DXP Scope 1 Expression Was: InNamedPolygon('TOP_LAYER_OUT2_P173')
Clearance Clearance_70 [All] p0 off: scope1count=1 scope1_0_kind=Board scope1_0_value=Board scope2count=1 scope2_0_kind=Board scope2_0_value=Board commentlength=76 gap=10 // Protel DXP Scope 1 Expression Was: InNamedPolygon('TOP_LAYER_OUT1_P129')
Clearance Clearance_71 [All] p0 off: scope1count=1 scope1_0_kind=Board scope1_0_value=Board scope2count=1 scope2_0_kind=Board scope2_0_value=Board commentlength=76 gap=10 // Protel DXP Scope 1 Expression Was: InNamedPolygon('TOP_LAYER_OUT2_P173')
Clearance Clearance_72 [All] p0 off: scope1count=1 scope1_0_kind=Board scope1_0_value=Board scope2count=1 scope2_0_kind=Board scope2_0_value=Board commentlength=118 gap=3.94 // Protel DXP Scope 1 Expression Was: InNamedPolygon('TOP_LAYER_OUT2_P173') Or  InNamedPolygon('TOP_LAYER_OUT1_P129')
Clearance Clearance_73 [All] p0 off: scope1count=1 scope1_0_kind=Board scope1_0_value=Board scope2count=1 scope2_0_kind=Board scope2_0_value=Board commentlength=118 gap=1.97 // Protel DXP Scope 1 Expression Was: InNamedPolygon('TOP_LAYER_OUT1_P129') Or  InNamedPolygon('TOP_LAYER_OUT2_P173')
Clearance Clearance_74 [All] p0 off: scope1count=1 scope1_0_kind=Board scope1_0_value=Board scope2count=1 scope2_0_kind=Board scope2_0_value=Board commentlength=75 gap=10 // Protel DXP Scope 1 Expression Was: InNamedPolygon('TOP_LAYER_GND_P121')
Clearance Clearance_75 [All] p0 off: scope1count=1 scope1_0_kind=Board scope1_0_value=Board scope2count=1 scope2_0_kind=Board scope2_0_value=Board commentlength=74 gap=10 // Protel DXP Scope 1 Expression Was: InNamedPolygon('TOP_LAYER_VM_P085')
Clearance Clearance_76 [All] p0 off: scope1count=1 scope1_0_kind=Board scope1_0_value=Board scope2count=1 scope2_0_kind=Board scope2_0_value=Board commentlength=76 gap=10 // Protel DXP Scope 1 Expression Was: InNamedPolygon('TOP_LAYER_OUT2_P173')
Clearance Clearance_77 [All] p0 off: scope1count=1 scope1_0_kind=Board scope1_0_value=Board scope2count=1 scope2_0_kind=Board scope2_0_value=Board commentlength=76 gap=10 // Protel DXP Scope 1 Expression Was: InNamedPolygon('TOP_LAYER_OUT1_P129')
Clearance Clearance_78 [All] p0 off: scope1count=1 scope1_0_kind=Board scope1_0_value=Board scope2count=1 scope2_0_kind=Board scope2_0_value=Board commentlength=75 gap=10 // Protel DXP Scope 1 Expression Was: InNamedPolygon('TOP_LAYER_GND_P086')
Clearance Clearance_79 [All] p0 off: scope1count=1 scope1_0_kind=Board scope1_0_value=Board scope2count=1 scope2_0_kind=Board scope2_0_value=Board commentlength=76 gap=10 // Protel DXP Scope 1 Expression Was: InNamedPolygon('TOP_LAYER_OUT1_P221')
Clearance Clearance_80 [All] p0 off: scope1count=1 scope1_0_kind=Board scope1_0_value=Board scope2count=1 scope2_0_kind=Board scope2_0_value=Board commentlength=76 gap=10 // Protel DXP Scope 1 Expression Was: InNamedPolygon('TOP_LAYER_OUT2_P173')
Clearance Clearance_81 [All] p0 off: scope1count=1 scope1_0_kind=Board scope1_0_value=Board scope2count=1 scope2_0_kind=Board scope2_0_value=Board commentlength=76 gap=10 // Protel DXP Scope 1 Expression Was: InNamedPolygon('TOP_LAYER_OUT2_P173')
Clearance Clearance_82 [All] p0 off: scope1count=1 scope1_0_kind=Board scope1_0_value=Board scope2count=1 scope2_0_kind=Board scope2_0_value=Board commentlength=76 gap=10 // Protel DXP Scope 1 Expression Was: InNamedPolygon('TOP_LAYER_OUT2_P173')
Clearance Clearance_83 [All] p0 off: scope1count=1 scope1_0_kind=Board scope1_0_value=Board scope2count=1 scope2_0_kind=Board scope2_0_value=Board commentlength=76 gap=3.94 // Protel DXP Scope 1 Expression Was: InNamedPolygon('TOP_LAYER_OUT1_P221')
Clearance Clearance_84 [All] p0 off: scope1count=1 scope1_0_kind=Board scope1_0_value=Board scope2count=1 scope2_0_kind=Board scope2_0_value=Board commentlength=75 gap=10 // Protel DXP Scope 1 Expression Was: InNamedPolygon('TOP_LAYER_GND_P086')
Clearance Clearance_85 [All] p0 off: scope1count=1 scope1_0_kind=Board scope1_0_value=Board scope2count=1 scope2_0_kind=Board scope2_0_value=Board commentlength=74 gap=10 // Protel DXP Scope 1 Expression Was: InNamedPolygon('TOP_LAYER_VM_P229')
Clearance Clearance_86 [All] p0 off: scope1count=1 scope1_0_kind=Board scope1_0_value=Board scope2count=1 scope2_0_kind=Board scope2_0_value=Board commentlength=75 gap=10 // Protel DXP Scope 1 Expression Was: InNamedPolygon('TOP_LAYER_GND_P237')
Clearance Clearance_87 [All] p0 off: scope1count=1 scope1_0_kind=Board scope1_0_value=Board scope2count=1 scope2_0_kind=Board scope2_0_value=Board commentlength=78 gap=10 // Protel DXP Scope 1 Expression Was: InNamedPolygon('BOTTOM_LAYER_GND_P204')
Clearance Clearance_88 [All] p0 off: scope1count=1 scope1_0_kind=Board scope1_0_value=Board scope2count=1 scope2_0_kind=Board scope2_0_value=Board commentlength=79 gap=10 // Protel DXP Scope 1 Expression Was: InNamedPolygon('BOTTOM_LAYER_OUT1_P205')
Clearance Clearance_89 [All] p0 off: scope1count=1 scope1_0_kind=Board scope1_0_value=Board scope2count=1 scope2_0_kind=Board scope2_0_value=Board commentlength=79 gap=10 // Protel DXP Scope 1 Expression Was: InNamedPolygon('BOTTOM_LAYER_OUT1_P205')
Clearance Clearance_90 [All] p0 off: scope1count=1 scope1_0_kind=Board scope1_0_value=Board scope2count=1 scope2_0_kind=Board scope2_0_value=Board commentlength=79 gap=10 // Protel DXP Scope 1 Expression Was: InNamedPolygon('BOTTOM_LAYER_OUT2_P211')
Clearance Clearance_91 [All] p0 off: scope1count=1 scope1_0_kind=Board scope1_0_value=Board scope2count=1 scope2_0_kind=Board scope2_0_value=Board commentlength=77 gap=10 // Protel DXP Scope 1 Expression Was: InNamedPolygon('BOTTOM_LAYER_VM_P080')
Clearance Clearance_92 [All] p0 off: scope1count=1 scope1_0_kind=Board scope1_0_value=Board scope2count=1 scope2_0_kind=Board scope2_0_value=Board commentlength=74 gap=10 // Protel DXP Scope 1 Expression Was: InNamedPolygon('TOP_LAYER_VM_P125')
Clearance Clearance_92 [InNamedPolygon('TOP_LAYER_VM_P125')] p1: gap=10 ignorepadtopadclearanceinfootprint=TRUE except(0: Arc-Hole Track-Hole SMDPad-Hole THPad-Hole Via-Hole Fill-Hole Poly-Hole Region-Hole Text-Hole)
Clearance Clearance_91 [InNamedPolygon('BOTTOM_LAYER_VM_P080')] p2: gap=10 ignorepadtopadclearanceinfootprint=TRUE except(0: Arc-Hole Track-Hole SMDPad-Hole THPad-Hole Via-Hole Fill-Hole Poly-Hole Region-Hole Text-Hole)
Clearance Clearance_90 [InNamedPolygon('BOTTOM_LAYER_OUT2_P211')] p3: gap=10 ignorepadtopadclearanceinfootprint=TRUE except(0: Arc-Hole Track-Hole SMDPad-Hole THPad-Hole Via-Hole Fill-Hole Poly-Hole Region-Hole Text-Hole)
Clearance Clearance_89 [InNamedPolygon('BOTTOM_LAYER_OUT1_P205')] p4: gap=10 ignorepadtopadclearanceinfootprint=TRUE except(0: Arc-Hole Track-Hole SMDPad-Hole THPad-Hole Via-Hole Fill-Hole Poly-Hole Region-Hole Text-Hole)
Clearance Clearance_88 [InNamedPolygon('BOTTOM_LAYER_OUT1_P205')] p5: gap=10 ignorepadtopadclearanceinfootprint=TRUE except(0: Arc-Hole Track-Hole SMDPad-Hole THPad-Hole Via-Hole Fill-Hole Poly-Hole Region-Hole Text-Hole)
Clearance Clearance_87 [InNamedPolygon('BOTTOM_LAYER_GND_P204')] p6: gap=10 ignorepadtopadclearanceinfootprint=TRUE except(0: Arc-Hole Track-Hole SMDPad-Hole THPad-Hole Via-Hole Fill-Hole Poly-Hole Region-Hole Text-Hole)
Clearance Clearance_86 [InNamedPolygon('TOP_LAYER_GND_P237')] p7: gap=10 ignorepadtopadclearanceinfootprint=TRUE except(0: Arc-Hole Track-Hole SMDPad-Hole THPad-Hole Via-Hole Fill-Hole Poly-Hole Region-Hole Text-Hole)
Clearance Clearance_85 [InNamedPolygon('TOP_LAYER_VM_P229')] p8: gap=10 ignorepadtopadclearanceinfootprint=TRUE except(0: Arc-Hole Track-Hole SMDPad-Hole THPad-Hole Via-Hole Fill-Hole Poly-Hole Region-Hole Text-Hole)
Clearance Clearance_84 [InNamedPolygon('TOP_LAYER_GND_P086')] p9: gap=10 ignorepadtopadclearanceinfootprint=TRUE except(0: Arc-Hole Track-Hole SMDPad-Hole THPad-Hole Via-Hole Fill-Hole Poly-Hole Region-Hole Text-Hole)
Clearance Clearance_83 [InNamedPolygon('TOP_LAYER_OUT1_P221')] p10: gap=3.94 ignorepadtopadclearanceinfootprint=TRUE except(0: Arc-Hole Track-Hole SMDPad-Hole THPad-Hole Via-Hole Fill-Hole Poly-Hole Region-Hole Text-Hole)
Clearance Clearance_82 [InNamedPolygon('TOP_LAYER_OUT2_P173')] p11: gap=10 ignorepadtopadclearanceinfootprint=TRUE except(0: Arc-Hole Track-Hole SMDPad-Hole THPad-Hole Via-Hole Fill-Hole Poly-Hole Region-Hole Text-Hole)
Clearance Clearance_81 [InNamedPolygon('TOP_LAYER_OUT2_P173')] p12: gap=10 ignorepadtopadclearanceinfootprint=TRUE except(0: Arc-Hole Track-Hole SMDPad-Hole THPad-Hole Via-Hole Fill-Hole Poly-Hole Region-Hole Text-Hole)
Clearance Clearance_80 [InNamedPolygon('TOP_LAYER_OUT2_P173')] p13: gap=10 ignorepadtopadclearanceinfootprint=TRUE except(0: Arc-Hole Track-Hole SMDPad-Hole THPad-Hole Via-Hole Fill-Hole Poly-Hole Region-Hole Text-Hole)
Clearance Clearance_79 [InNamedPolygon('TOP_LAYER_OUT1_P221')] p14: gap=10 ignorepadtopadclearanceinfootprint=TRUE except(0: Arc-Hole Track-Hole SMDPad-Hole THPad-Hole Via-Hole Fill-Hole Poly-Hole Region-Hole Text-Hole)
Clearance Clearance_78 [InNamedPolygon('TOP_LAYER_GND_P086')] p15: gap=10 ignorepadtopadclearanceinfootprint=TRUE except(0: Arc-Hole Track-Hole SMDPad-Hole THPad-Hole Via-Hole Fill-Hole Poly-Hole Region-Hole Text-Hole)
Clearance Clearance_77 [InNamedPolygon('TOP_LAYER_OUT1_P129')] p16: gap=10 ignorepadtopadclearanceinfootprint=TRUE except(0: Arc-Hole Track-Hole SMDPad-Hole THPad-Hole Via-Hole Fill-Hole Poly-Hole Region-Hole Text-Hole)
Clearance Clearance_76 [InNamedPolygon('TOP_LAYER_OUT2_P173')] p17: gap=10 ignorepadtopadclearanceinfootprint=TRUE except(0: Arc-Hole Track-Hole SMDPad-Hole THPad-Hole Via-Hole Fill-Hole Poly-Hole Region-Hole Text-Hole)
Clearance Clearance_75 [InNamedPolygon('TOP_LAYER_VM_P085')] p18: gap=10 ignorepadtopadclearanceinfootprint=TRUE except(0: Arc-Hole Track-Hole SMDPad-Hole THPad-Hole Via-Hole Fill-Hole Poly-Hole Region-Hole Text-Hole)
Clearance Clearance_74 [InNamedPolygon('TOP_LAYER_GND_P121')] p19: gap=10 ignorepadtopadclearanceinfootprint=TRUE except(0: Arc-Hole Track-Hole SMDPad-Hole THPad-Hole Via-Hole Fill-Hole Poly-Hole Region-Hole Text-Hole)
Clearance Clearance_73 [InNamedPolygon('TOP_LAYER_OUT1_P129') Or  InNamedPolygon('TOP_LAYER_OUT2_P173')] p20: gap=1.97 ignorepadtopadclearanceinfootprint=TRUE except(0: Arc-Hole Track-Hole SMDPad-Hole THPad-Hole Via-Hole Fill-Hole Poly-Hole Region-Hole Text-Hole)
Clearance Clearance_72 [InNamedPolygon('TOP_LAYER_OUT2_P173') Or  InNamedPolygon('TOP_LAYER_OUT1_P129')] p21: gap=3.94 ignorepadtopadclearanceinfootprint=TRUE except(0: Arc-Hole Track-Hole SMDPad-Hole THPad-Hole Via-Hole Fill-Hole Poly-Hole Region-Hole Text-Hole)
Clearance Clearance_71 [InNamedPolygon('TOP_LAYER_OUT2_P173')] p22: gap=10 ignorepadtopadclearanceinfootprint=TRUE except(0: Arc-Hole Track-Hole SMDPad-Hole THPad-Hole Via-Hole Fill-Hole Poly-Hole Region-Hole Text-Hole)
Clearance Clearance_70 [InNamedPolygon('TOP_LAYER_OUT1_P129')] p23: gap=10 ignorepadtopadclearanceinfootprint=TRUE except(0: Arc-Hole Track-Hole SMDPad-Hole THPad-Hole Via-Hole Fill-Hole Poly-Hole Region-Hole Text-Hole)
Clearance Clearance_69 [InNamedPolygon('TOP_LAYER_OUT2_P173')] p24: gap=3.94 ignorepadtopadclearanceinfootprint=TRUE except(0: Arc-Hole Track-Hole SMDPad-Hole THPad-Hole Via-Hole Fill-Hole Poly-Hole Region-Hole Text-Hole)
Clearance Clearance_68 [InNamedPolygon('TOP_LAYER_OUT1_P129')] p25: gap=3.94 ignorepadtopadclearanceinfootprint=TRUE except(0: Arc-Hole Track-Hole SMDPad-Hole THPad-Hole Via-Hole Fill-Hole Poly-Hole Region-Hole Text-Hole)
Clearance Clearance_67 [InNamedPolygon('TOP_LAYER_VM_P085')] p26: gap=3.94 ignorepadtopadclearanceinfootprint=TRUE except(0: Arc-Hole Track-Hole SMDPad-Hole THPad-Hole Via-Hole Fill-Hole Poly-Hole Region-Hole Text-Hole)
Clearance Clearance_66 [InNamedPolygon('BOTTOM_LAYER_P_IN_P174')] p27: gap=10 ignorepadtopadclearanceinfootprint=TRUE except(0: Arc-Hole Track-Hole SMDPad-Hole THPad-Hole Via-Hole Fill-Hole Poly-Hole Region-Hole Text-Hole)
Clearance Clearance_65 [InNamedPolygon('BOTTOM_LAYER_NETF1_2_P203')] p28: gap=10 ignorepadtopadclearanceinfootprint=TRUE except(0: Arc-Hole Track-Hole SMDPad-Hole THPad-Hole Via-Hole Fill-Hole Poly-Hole Region-Hole Text-Hole)
Clearance Clearance_64 [InNamedPolygon('BOTTOM_LAYER_VBAT_P165')] p29: gap=10 ignorepadtopadclearanceinfootprint=TRUE except(0: Arc-Hole Track-Hole SMDPad-Hole THPad-Hole Via-Hole Fill-Hole Poly-Hole Region-Hole Text-Hole)
Clearance Clearance_63 [InNamedPolygon('TOP_LAYER_VM_P167')] p30: gap=10 ignorepadtopadclearanceinfootprint=TRUE except(0: Arc-Hole Track-Hole SMDPad-Hole THPad-Hole Via-Hole Fill-Hole Poly-Hole Region-Hole Text-Hole)
Clearance Clearance_62 [InNamedPolygon('TOP_LAYER_VM_P167')] p31: gap=10 ignorepadtopadclearanceinfootprint=TRUE except(0: Arc-Hole Track-Hole SMDPad-Hole THPad-Hole Via-Hole Fill-Hole Poly-Hole Region-Hole Text-Hole)
Clearance Clearance_61 [InNamedPolygon('TOP_LAYER_VM_P171')] p32: gap=10 ignorepadtopadclearanceinfootprint=TRUE except(0: Arc-Hole Track-Hole SMDPad-Hole THPad-Hole Via-Hole Fill-Hole Poly-Hole Region-Hole Text-Hole)
Clearance Clearance_60 [InNamedPolygon('SIGNAL_LAYER_2_NETF1_2_P196')] p33: gap=10 ignorepadtopadclearanceinfootprint=TRUE except(0: Arc-Hole Track-Hole SMDPad-Hole THPad-Hole Via-Hole Fill-Hole Poly-Hole Region-Hole Text-Hole)
Clearance Clearance_59 [InNamedPolygon('SIGNAL_LAYER_2_VBAT_P197')] p34: gap=10 ignorepadtopadclearanceinfootprint=TRUE except(0: Arc-Hole Track-Hole SMDPad-Hole THPad-Hole Via-Hole Fill-Hole Poly-Hole Region-Hole Text-Hole)
Clearance Clearance_58 [InNamedPolygon('SIGNAL_LAYER_2_P_IN_P198')] p35: gap=10 ignorepadtopadclearanceinfootprint=TRUE except(0: Arc-Hole Track-Hole SMDPad-Hole THPad-Hole Via-Hole Fill-Hole Poly-Hole Region-Hole Text-Hole)
Clearance Clearance_57 [InNamedPolygon('SIGNAL_LAYER_2_3V3_P194')] p36: gap=10 ignorepadtopadclearanceinfootprint=TRUE except(0: Arc-Hole Track-Hole SMDPad-Hole THPad-Hole Via-Hole Fill-Hole Poly-Hole Region-Hole Text-Hole)
Clearance Clearance_56 [InNamedPolygon('TOP_LAYER_NETF1_2_P207')] p37: gap=10 ignorepadtopadclearanceinfootprint=TRUE except(0: Arc-Hole Track-Hole SMDPad-Hole THPad-Hole Via-Hole Fill-Hole Poly-Hole Region-Hole Text-Hole)
Clearance Clearance_55 [InNamedPolygon('TOP_LAYER_VBAT_P223')] p38: gap=10 ignorepadtopadclearanceinfootprint=TRUE except(0: Arc-Hole Track-Hole SMDPad-Hole THPad-Hole Via-Hole Fill-Hole Poly-Hole Region-Hole Text-Hole)
Clearance Clearance_54 [InNamedPolygon('TOP_LAYER_P_IN_P227')] p39: gap=10 ignorepadtopadclearanceinfootprint=TRUE except(0: Arc-Hole Track-Hole SMDPad-Hole THPad-Hole Via-Hole Fill-Hole Poly-Hole Region-Hole Text-Hole)
Clearance Clearance_53 [InNamedPolygon('TOP_LAYER_GND_P086')] p40: gap=10 ignorepadtopadclearanceinfootprint=TRUE except(0: Arc-Hole Track-Hole SMDPad-Hole THPad-Hole Via-Hole Fill-Hole Poly-Hole Region-Hole Text-Hole)
Clearance Clearance_52 [InNamedPolygon('SIGNAL_LAYER_2_VM_P177') Or  InNamedPolygon('SIGNAL_LAYER_2_VM_P179') Or  InNamedPolygon('SIGNAL_LAYER_2_VM_P160') Or  InNamedPolygon('SIGNAL_LAYER_2_VM_P175') Or  InNamedPolygon('SIGNAL_LAYER_2_VM_P181')] p41: gap=10 ignorepadtopadclearanceinfootprint=TRUE except(0: Arc-Hole Track-Hole SMDPad-Hole THPad-Hole Via-Hole Fill-Hole Poly-Hole Region-Hole Text-Hole)
Clearance Clearance_51 [InNamedPolygon('SIGNAL_LAYER_2_EZFET_VBUS_P136')] p42: gap=10 ignorepadtopadclearanceinfootprint=TRUE except(0: Arc-Hole Track-Hole SMDPad-Hole THPad-Hole Via-Hole Fill-Hole Poly-Hole Region-Hole Text-Hole)
Clearance Clearance_50 [InNamedPolygon('SIGNAL_LAYER_2_EZFET_VCC_P132')] p43: gap=10 ignorepadtopadclearanceinfootprint=TRUE except(0: Arc-Hole Track-Hole SMDPad-Hole THPad-Hole Via-Hole Fill-Hole Poly-Hole Region-Hole Text-Hole)
Clearance Clearance_49 [InNamedPolygon('SIGNAL_LAYER_2_MCU_3V3_P192')] p44: gap=10 ignorepadtopadclearanceinfootprint=TRUE except(0: Arc-Hole Track-Hole SMDPad-Hole THPad-Hole Via-Hole Fill-Hole Poly-Hole Region-Hole Text-Hole)
Clearance Clearance_48 [InNamedPolygon('SIGNAL_LAYER_1_GND_P190')] p45: gap=10 ignorepadtopadclearanceinfootprint=TRUE except(0: Arc-Hole Track-Hole SMDPad-Hole THPad-Hole Via-Hole Fill-Hole Poly-Hole Region-Hole Text-Hole)
Clearance Clearance_47 [InNamedPolygon('SIGNAL_LAYER_1_GND_P184')] p46: gap=10 ignorepadtopadclearanceinfootprint=TRUE except(0: Arc-Hole Track-Hole SMDPad-Hole THPad-Hole Via-Hole Fill-Hole Poly-Hole Region-Hole Text-Hole)
Clearance Clearance_46 [InNamedPolygon('BOTTOM_LAYER_GND_P241')] p47: gap=10 ignorepadtopadclearanceinfootprint=TRUE except(0: Arc-Hole Track-Hole SMDPad-Hole THPad-Hole Via-Hole Fill-Hole Poly-Hole Region-Hole Text-Hole)
Clearance Clearance_45 [InNamedPolygon('BOTTOM_LAYER_GND_P241')] p48: gap=10 ignorepadtopadclearanceinfootprint=TRUE except(0: Arc-Hole Track-Hole SMDPad-Hole THPad-Hole Via-Hole Fill-Hole Poly-Hole Region-Hole Text-Hole)
Clearance Clearance_44 [InNamedPolygon('BOTTOM_LAYER_OUT2_P163')] p49: gap=10 ignorepadtopadclearanceinfootprint=TRUE except(0: Arc-Hole Track-Hole SMDPad-Hole THPad-Hole Via-Hole Fill-Hole Poly-Hole Region-Hole Text-Hole)
Clearance Clearance_43 [InNamedPolygon('BOTTOM_LAYER_VM_P166')] p50: gap=10 ignorepadtopadclearanceinfootprint=TRUE except(0: Arc-Hole Track-Hole SMDPad-Hole THPad-Hole Via-Hole Fill-Hole Poly-Hole Region-Hole Text-Hole)
Clearance Clearance_42 [InNamedPolygon('BOTTOM_LAYER_VM_P235')] p51: gap=10 ignorepadtopadclearanceinfootprint=TRUE except(0: Arc-Hole Track-Hole SMDPad-Hole THPad-Hole Via-Hole Fill-Hole Poly-Hole Region-Hole Text-Hole)
Clearance Clearance_41 [InNamedPolygon('BOTTOM_LAYER_OUT1_P164')] p52: gap=10 ignorepadtopadclearanceinfootprint=TRUE except(0: Arc-Hole Track-Hole SMDPad-Hole THPad-Hole Via-Hole Fill-Hole Poly-Hole Region-Hole Text-Hole)
Clearance Clearance_40 [InNamedPolygon('BOTTOM_LAYER_GND_P162')] p53: gap=10 ignorepadtopadclearanceinfootprint=TRUE except(0: Arc-Hole Track-Hole SMDPad-Hole THPad-Hole Via-Hole Fill-Hole Poly-Hole Region-Hole Text-Hole)
Clearance Clearance_39 [InNamedPolygon('SIGNAL_LAYER_2_VM_P160')] p54: gap=10 ignorepadtopadclearanceinfootprint=TRUE except(0: Arc-Hole Track-Hole SMDPad-Hole THPad-Hole Via-Hole Fill-Hole Poly-Hole Region-Hole Text-Hole)
Clearance Clearance_38 [InNamedPolygon('SIGNAL_LAYER_2_NONET_P138')] p55: gap=10 ignorepadtopadclearanceinfootprint=TRUE except(0: Arc-Hole Track-Hole SMDPad-Hole THPad-Hole Via-Hole Fill-Hole Poly-Hole Region-Hole Text-Hole)
Clearance Clearance_37 [InNamedPolygon('SIGNAL_LAYER_1_VM_P146')] p56: gap=10 ignorepadtopadclearanceinfootprint=TRUE except(0: Arc-Hole Track-Hole SMDPad-Hole THPad-Hole Via-Hole Fill-Hole Poly-Hole Region-Hole Text-Hole)
Clearance Clearance_36 [InNamedPolygon('SIGNAL_LAYER_2_GND_P156')] p57: gap=10 ignorepadtopadclearanceinfootprint=TRUE except(0: Arc-Hole Track-Hole SMDPad-Hole THPad-Hole Via-Hole Fill-Hole Poly-Hole Region-Hole Text-Hole)
Clearance Clearance_35 [InNamedPolygon('SIGNAL_LAYER_1_VM_P148') Or  InNamedPolygon('SIGNAL_LAYER_1_VM_P148')] p58: gap=10 ignorepadtopadclearanceinfootprint=TRUE except(0: Arc-Hole Track-Hole SMDPad-Hole THPad-Hole Via-Hole Fill-Hole Poly-Hole Region-Hole Text-Hole)
Clearance Clearance_34 [InNamedPolygon('SIGNAL_LAYER_1_GND_P154')] p59: gap=10 ignorepadtopadclearanceinfootprint=TRUE except(0: Arc-Hole Track-Hole SMDPad-Hole THPad-Hole Via-Hole Fill-Hole Poly-Hole Region-Hole Text-Hole)
Clearance Clearance_33 [InNamedPolygon('SIGNAL_LAYER_2_NONET_P138')] p60: gap=10 ignorepadtopadclearanceinfootprint=TRUE except(0: Arc-Hole Track-Hole SMDPad-Hole THPad-Hole Via-Hole Fill-Hole Poly-Hole Region-Hole Text-Hole)
Clearance Clearance_32 [InNamedPolygon('SIGNAL_LAYER_2_GND_P082')] p61: gap=10 ignorepadtopadclearanceinfootprint=TRUE except(0: Arc-Hole Track-Hole SMDPad-Hole THPad-Hole Via-Hole Fill-Hole Poly-Hole Region-Hole Text-Hole)
Clearance Clearance_31 [InNamedPolygon('TOP_LAYER_GND_P076')] p62: gap=10 ignorepadtopadclearanceinfootprint=TRUE except(0: Arc-Hole Track-Hole SMDPad-Hole THPad-Hole Via-Hole Fill-Hole Poly-Hole Region-Hole Text-Hole)
Clearance Clearance_30 [InNamedPolygon('TOP_LAYER_GND_P087')] p63: gap=10 ignorepadtopadclearanceinfootprint=TRUE except(0: Arc-Hole Track-Hole SMDPad-Hole THPad-Hole Via-Hole Fill-Hole Poly-Hole Region-Hole Text-Hole)
Clearance Clearance_29 [InNamedPolygon('TOP_LAYER_VM_P127') Or  InNamedPolygon('TOP_LAYER_VM_P085')] p64: gap=10 ignorepadtopadclearanceinfootprint=TRUE except(0: Arc-Hole Track-Hole SMDPad-Hole THPad-Hole Via-Hole Fill-Hole Poly-Hole Region-Hole Text-Hole)
Clearance Clearance_28 [InNamedPolygon('TOP_LAYER_GND_P117')] p65: gap=10 ignorepadtopadclearanceinfootprint=TRUE except(0: Arc-Hole Track-Hole SMDPad-Hole THPad-Hole Via-Hole Fill-Hole Poly-Hole Region-Hole Text-Hole)
Clearance Clearance_27 [InNamedPolygon('TOP_LAYER_OUT1_P129') Or  InNamedPolygon('TOP_LAYER_OUT2_P173')] p66: gap=10 ignorepadtopadclearanceinfootprint=TRUE except(0: Arc-Hole Track-Hole SMDPad-Hole THPad-Hole Via-Hole Fill-Hole Poly-Hole Region-Hole Text-Hole)
Clearance Clearance_26 [InNamedPolygon('SIGNAL_LAYER_2_NONET_P113')] p67: gap=10 ignorepadtopadclearanceinfootprint=TRUE except(0: Arc-Hole Track-Hole SMDPad-Hole THPad-Hole Via-Hole Fill-Hole Poly-Hole Region-Hole Text-Hole)
Clearance Clearance_25 [InNamedPolygon('BOTTOM_LAYER_NONET_P115')] p68: gap=10 ignorepadtopadclearanceinfootprint=TRUE except(0: Arc-Hole Track-Hole SMDPad-Hole THPad-Hole Via-Hole Fill-Hole Poly-Hole Region-Hole Text-Hole)
Clearance Clearance_24 [InNamedPolygon('SIGNAL_LAYER_1_NONET_P111')] p69: gap=10 ignorepadtopadclearanceinfootprint=TRUE except(0: Arc-Hole Track-Hole SMDPad-Hole THPad-Hole Via-Hole Fill-Hole Poly-Hole Region-Hole Text-Hole)
Clearance Clearance_23 [InNamedPolygon('TOP_LAYER_NONET_P083')] p70: gap=10 ignorepadtopadclearanceinfootprint=TRUE except(0: Arc-Hole Track-Hole SMDPad-Hole THPad-Hole Via-Hole Fill-Hole Poly-Hole Region-Hole Text-Hole)
Clearance Clearance_22 [InNamedPolygon('TOP_LAYER_NONET_P105')] p71: gap=10 ignorepadtopadclearanceinfootprint=TRUE except(0: Arc-Hole Track-Hole SMDPad-Hole THPad-Hole Via-Hole Fill-Hole Poly-Hole Region-Hole Text-Hole)
Clearance Clearance_21 [InNamedPolygon('TOP_LAYER_OUT2_P107')] p72: gap=10 ignorepadtopadclearanceinfootprint=TRUE except(0: Arc-Hole Track-Hole SMDPad-Hole THPad-Hole Via-Hole Fill-Hole Poly-Hole Region-Hole Text-Hole)
Clearance Clearance_20 [InNamedPolygon('TOP_LAYER_NONET_P101')] p73: gap=10 ignorepadtopadclearanceinfootprint=TRUE except(0: Arc-Hole Track-Hole SMDPad-Hole THPad-Hole Via-Hole Fill-Hole Poly-Hole Region-Hole Text-Hole)
Clearance Clearance_19 [InNamedPolygon('TOP_LAYER_OUT1_P103')] p74: gap=10 ignorepadtopadclearanceinfootprint=TRUE except(0: Arc-Hole Track-Hole SMDPad-Hole THPad-Hole Via-Hole Fill-Hole Poly-Hole Region-Hole Text-Hole)
Clearance Clearance_18 [InNet('OUT1')] p75: gap=10 ignorepadtopadclearanceinfootprint=TRUE except(0: Arc-Hole Track-Hole SMDPad-Hole THPad-Hole Via-Hole Fill-Hole Poly-Hole Region-Hole Text-Hole)
Clearance Clearance_17 [InNamedPolygon('TOP_LAYER_OUT1_P000')] p76: gap=10 ignorepadtopadclearanceinfootprint=TRUE except(0: Arc-Hole Track-Hole SMDPad-Hole THPad-Hole Via-Hole Fill-Hole Poly-Hole Region-Hole Text-Hole)
Clearance Clearance_16 [InNamedPolygon('TOP_LAYER_OUT1_P000') vs InNet('OUT1')] p77: gap=3.94 ignorepadtopadclearanceinfootprint=TRUE except(0: Arc-Hole Track-Hole SMDPad-Hole THPad-Hole Via-Hole Fill-Hole Poly-Hole Region-Hole Text-Hole)
Clearance Clearance_15 [InNamedPolygon('TOP_LAYER_OUT1_P000')] p78: gap=3.94 ignorepadtopadclearanceinfootprint=TRUE except(0: Arc-Hole Track-Hole SMDPad-Hole THPad-Hole Via-Hole Fill-Hole Poly-Hole Region-Hole Text-Hole)
Clearance Clearance_14 [InNamedPolygon('TOP_LAYER_NONET_P093')] p79: gap=3.94 ignorepadtopadclearanceinfootprint=TRUE except(0: Arc-Hole Track-Hole SMDPad-Hole THPad-Hole Via-Hole Fill-Hole Poly-Hole Region-Hole Text-Hole)
Clearance Clearance_13 [InNamedPolygon('TOP_LAYER_NONET_P093')] p80: gap=10 ignorepadtopadclearanceinfootprint=TRUE except(0: Arc-Hole Track-Hole SMDPad-Hole THPad-Hole Via-Hole Fill-Hole Poly-Hole Region-Hole Text-Hole)
Clearance Clearance_12 [InNamedPolygon('TOP_LAYER_OUT2_P099')] p81: gap=10 ignorepadtopadclearanceinfootprint=TRUE except(0: Arc-Hole Track-Hole SMDPad-Hole THPad-Hole Via-Hole Fill-Hole Poly-Hole Region-Hole Text-Hole)
Clearance Clearance_11 [InNamedPolygon('TOP_LAYER_OUT2_P099')] p82: gap=10 ignorepadtopadclearanceinfootprint=TRUE except(0: Arc-Hole Track-Hole SMDPad-Hole THPad-Hole Via-Hole Fill-Hole Poly-Hole Region-Hole Text-Hole)
Clearance Clearance_10 [InNamedPolygon('TOP_LAYER_OUT1_P000')] p83: gap=10 ignorepadtopadclearanceinfootprint=TRUE except(0: Arc-Hole Track-Hole SMDPad-Hole THPad-Hole Via-Hole Fill-Hole Poly-Hole Region-Hole Text-Hole)
Clearance Clearance_9 [InNamedPolygon('TOP_LAYER_OUT1_P000')] p84: gap=10 ignorepadtopadclearanceinfootprint=TRUE except(0: Arc-Hole Track-Hole SMDPad-Hole THPad-Hole Via-Hole Fill-Hole Poly-Hole Region-Hole Text-Hole)
Clearance Clearance_8 [InNamedPolygon('BOTTOM_LAYER_NONET_P079') Or  InNamedPolygon('SIGNAL_LAYER_2_NONET_P078') Or  InNamedPolygon('SIGNAL_LAYER_1_NONET_P077') Or  InNamedPolygon('TOP_LAYER_NONET_P083') Or  InNamedPolygon('BOTTOM_LAYER_NONET_P072') Or  InNamedPolygon('SIGNAL_LAYER_2_NONET_P070') Or  InNamedPolygon('SIGNAL_LAYER_1_NONET_P059') Or  InNamedPolygon('TOP_LAYER_OUT2_P058') Or  InNamedPolygon('BOTTOM_LAYER_NONET_P056') Or  InNamedPolygon('SIGNAL_LAYER_2_NONET_P054') Or  InNamedPolygon('SIGNAL_LAYER_1_NONET_P052') Or  InNamedPolygon('TOP_LAYER_OUT1_P050') Or  InNamedPolygon('BOTTOM_LAYER_VM_P044') Or  InNamedPolygon('SIGNAL_LAYER_2_VM_P042') Or  InNamedPolygon('SIGNAL_LAYER_1_VM_P040') Or  InNamedPolygon('TOP_LAYER_VM_P038') Or  InNamedPolygon('BOTTOM_LAYER_VM_P036') Or  InNamedPolygon('SIGNAL_LAYER_2_VM_P018') Or  InNamedPolygon('SIGNAL_LAYER_1_VM_P016') Or  InNamedPolygon('TOP_LAYER_VM_P003')] p85: gap=10 ignorepadtopadclearanceinfootprint=TRUE except(0: Arc-Hole Track-Hole SMDPad-Hole THPad-Hole Via-Hole Fill-Hole Poly-Hole Region-Hole Text-Hole)
Clearance Clearance_7 [InNamedPolygon('TOP_LAYER_NONET_P089') Or  InNamedPolygon('TOP_LAYER_NONET_P090')] p86: gap=10 ignorepadtopadclearanceinfootprint=TRUE except(0: Arc-Hole Track-Hole SMDPad-Hole THPad-Hole Via-Hole Fill-Hole Poly-Hole Region-Hole Text-Hole)
Clearance Clearance_6 [InNamedPolygon('BOTTOM_LAYER_EZFET_USB_SHIELD_P002') Or  InNamedPolygon('TOP_LAYER_EZFET_USB_SHIELD_P201') Or  InNamedPolygon('SIGNAL_LAYER_2_EZFET_VBUS_P018') Or  InNamedPolygon('SIGNAL_LAYER_2_EZFET_VCC_P016')] p87: gap=10 ignorepadtopadclearanceinfootprint=TRUE except(0: Arc-Hole Track-Hole SMDPad-Hole THPad-Hole Via-Hole Fill-Hole Poly-Hole Region-Hole Text-Hole)